# Altium PCB LST.PcbDoc (part 1 of 6)
Units mil, origin at the board's own origin, x right, y up, seen from the top; angles counter-clockwise.
Board outline 4330.71 x 4330.71 mil, 2 copper layers (Top Layer, Bottom Layer), stack 50 mil thick; 464 components, 242 nets, 1328 pads, 128 vias.
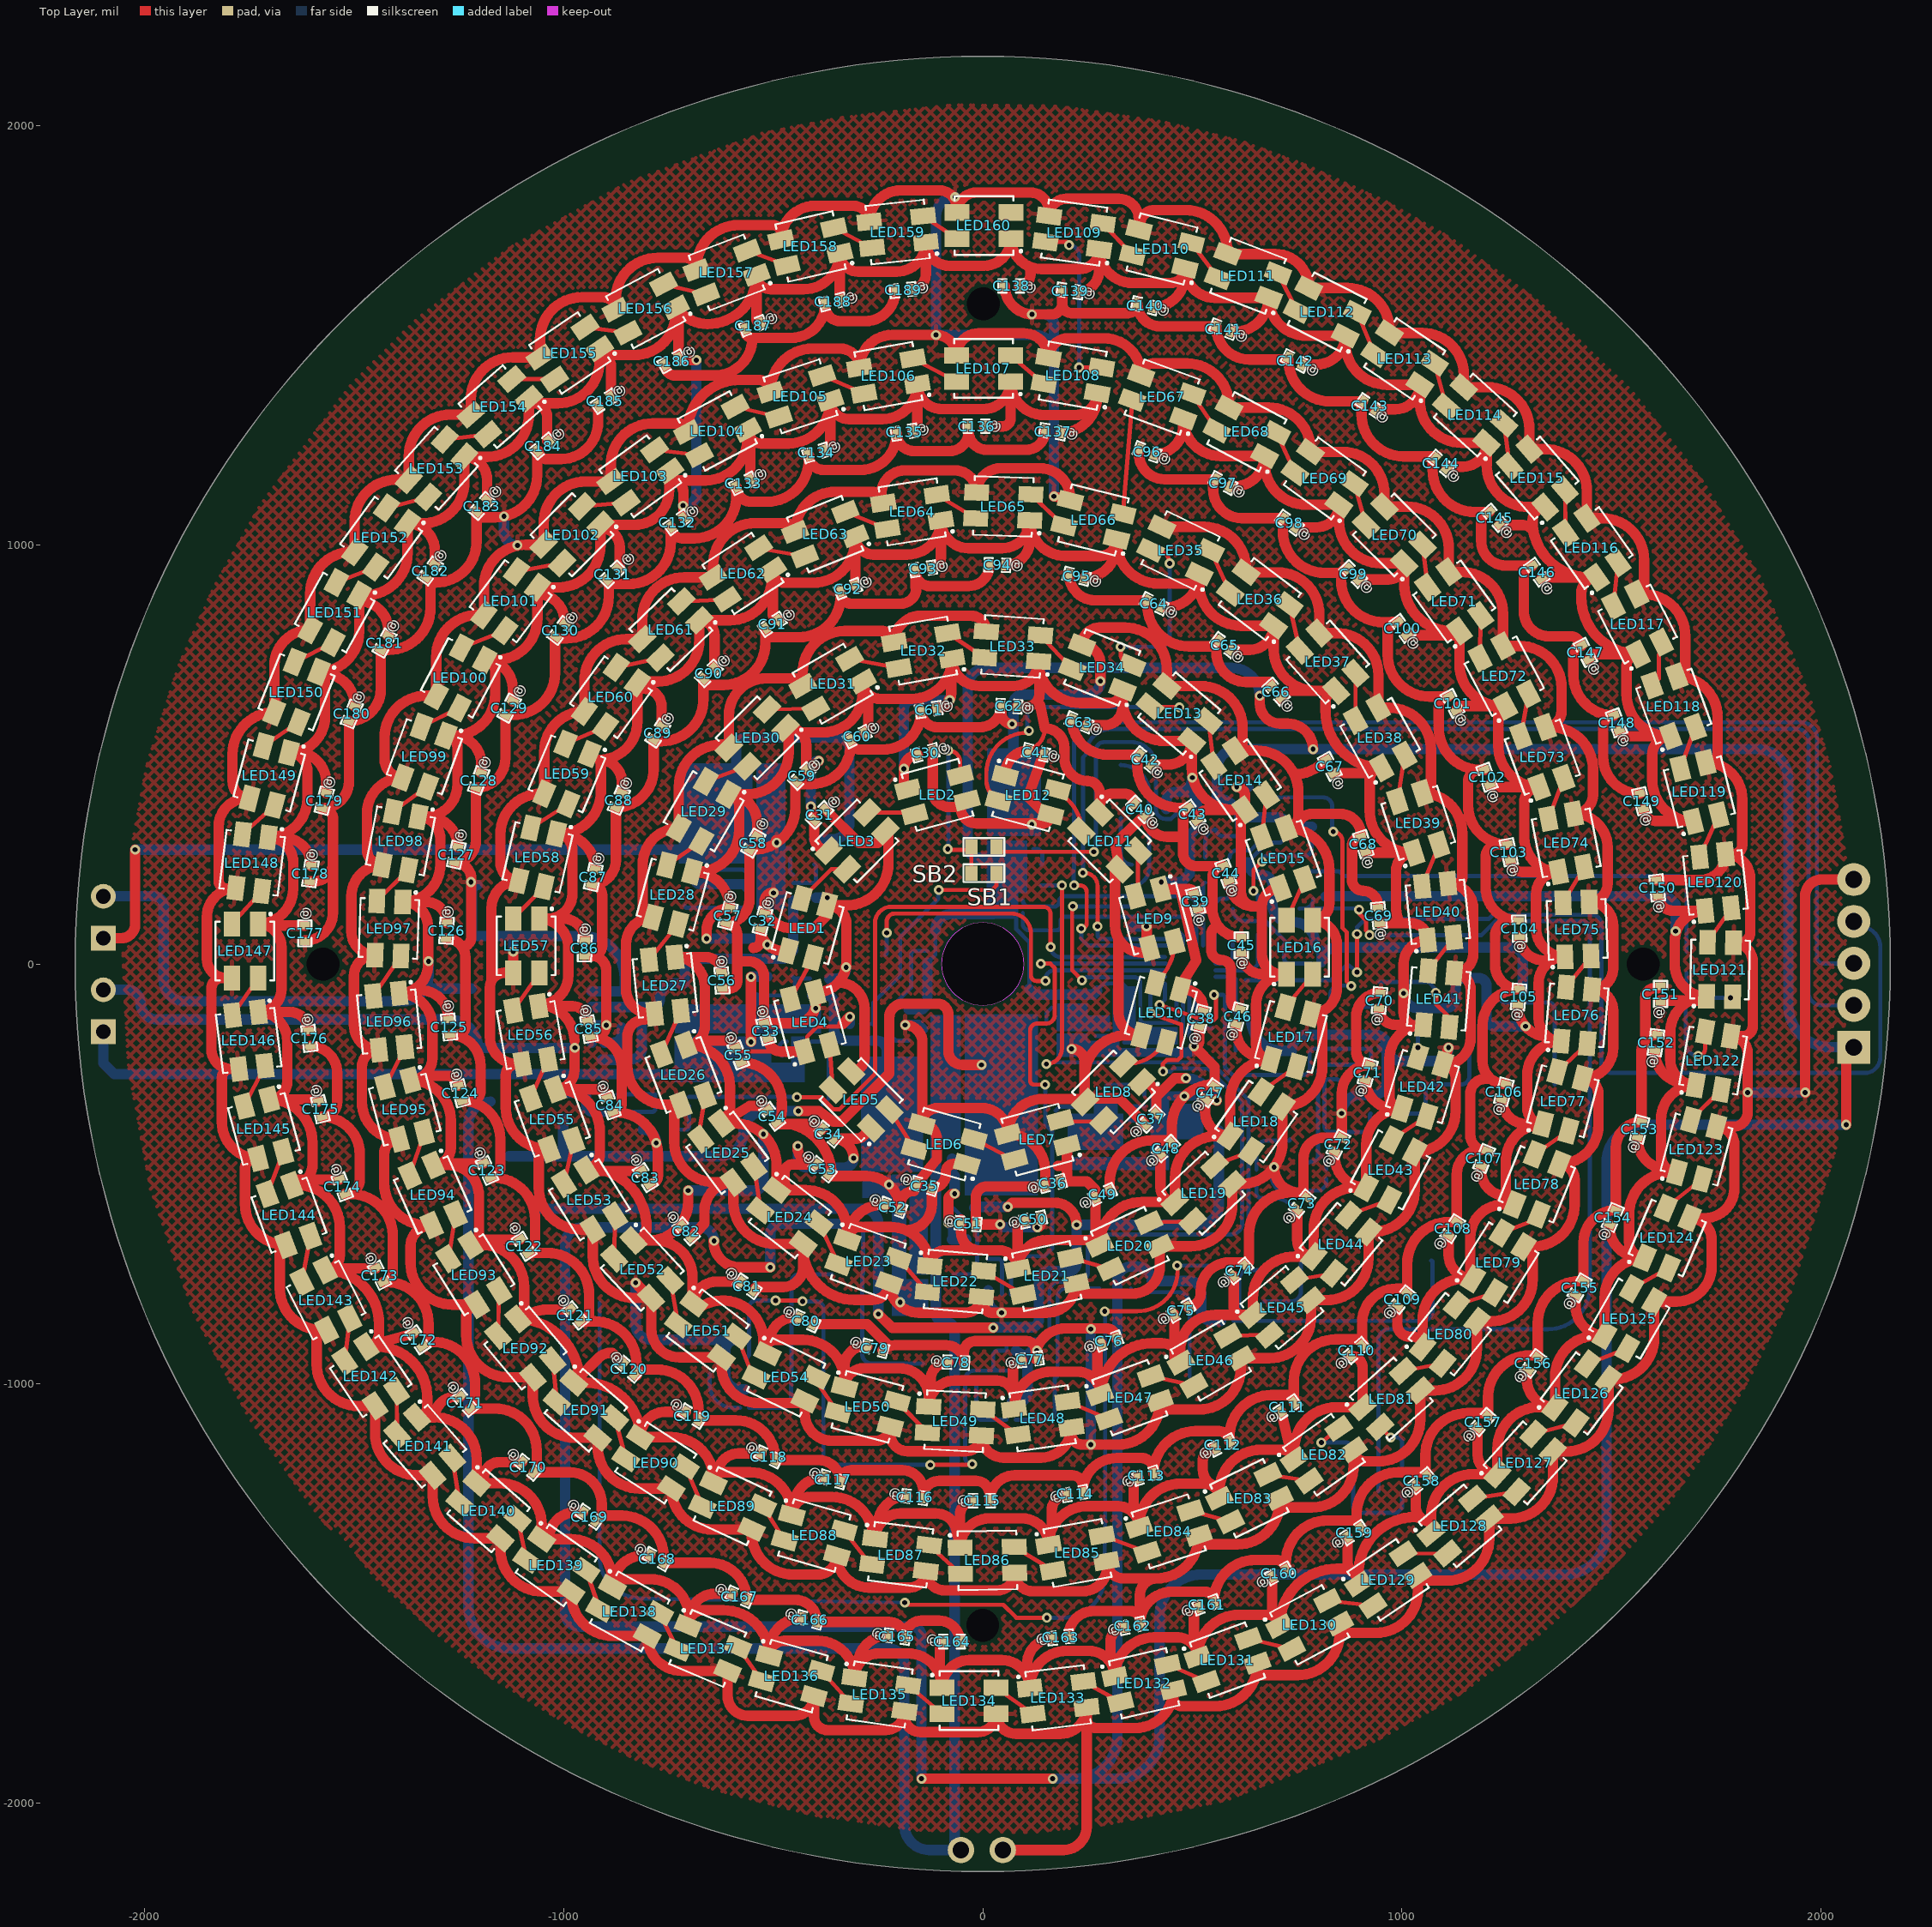
[diagram p0: Top Layer view]
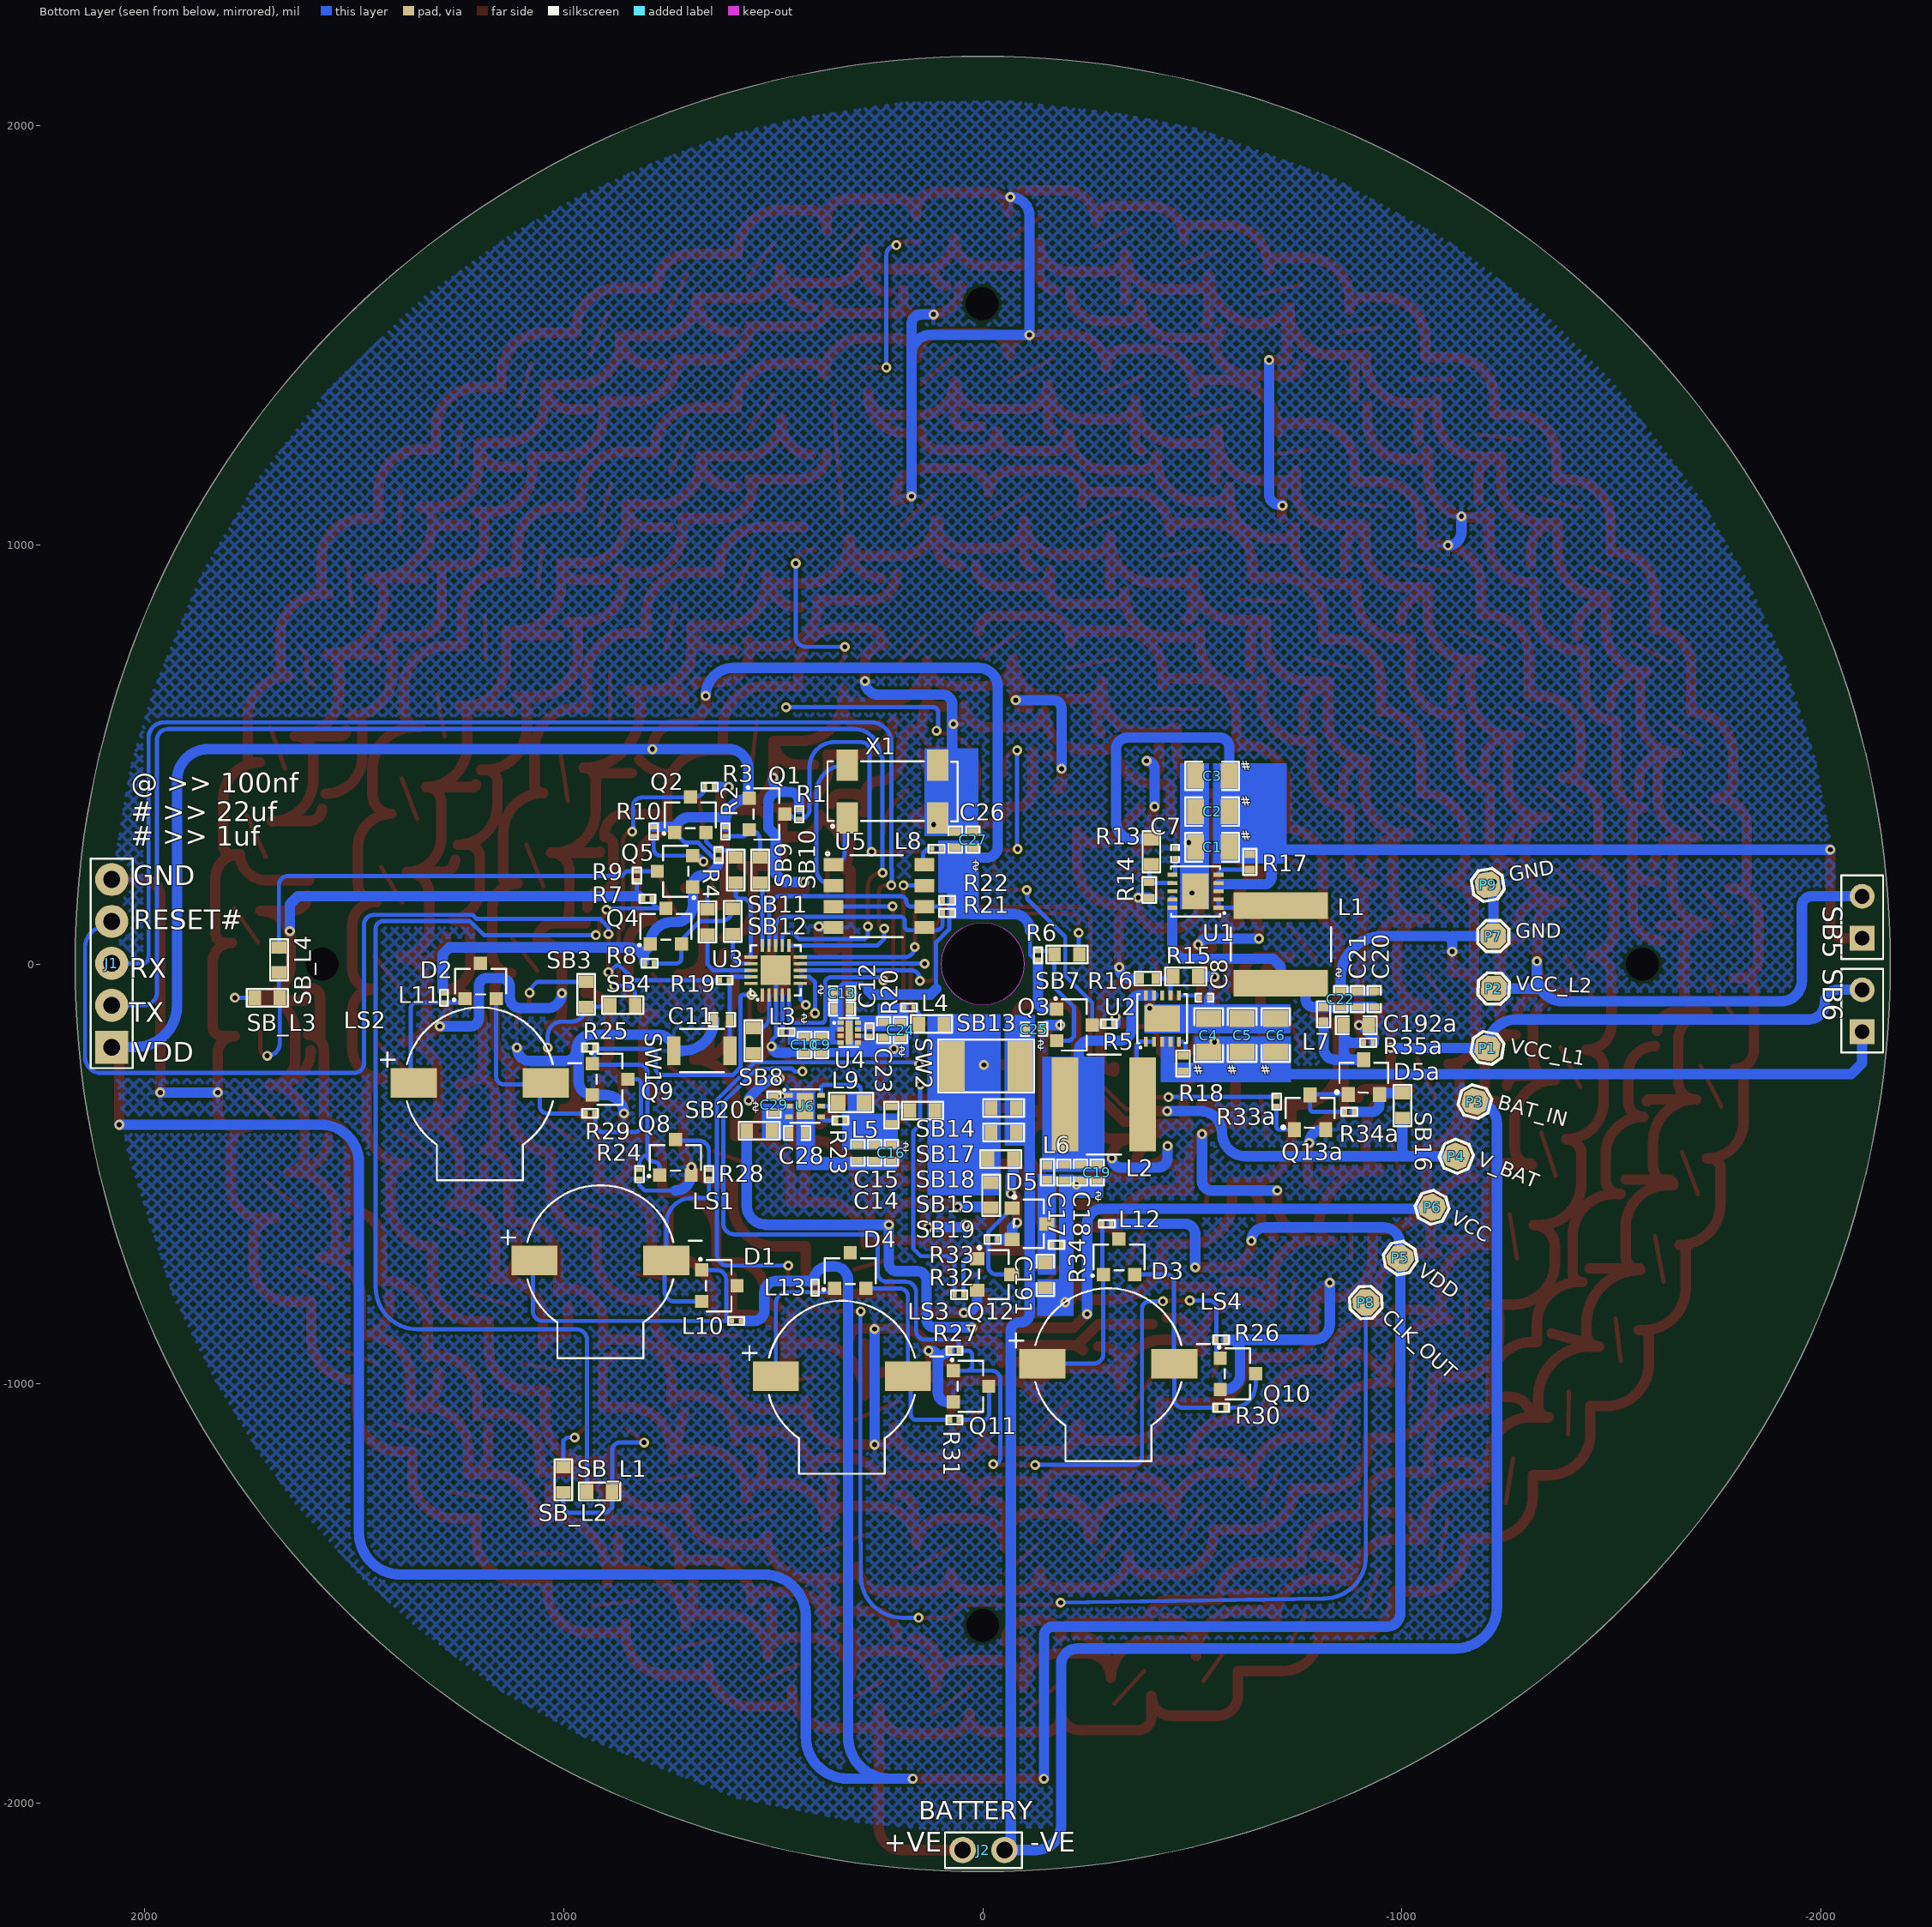
[diagram p1: Bottom Layer view, seen from below]
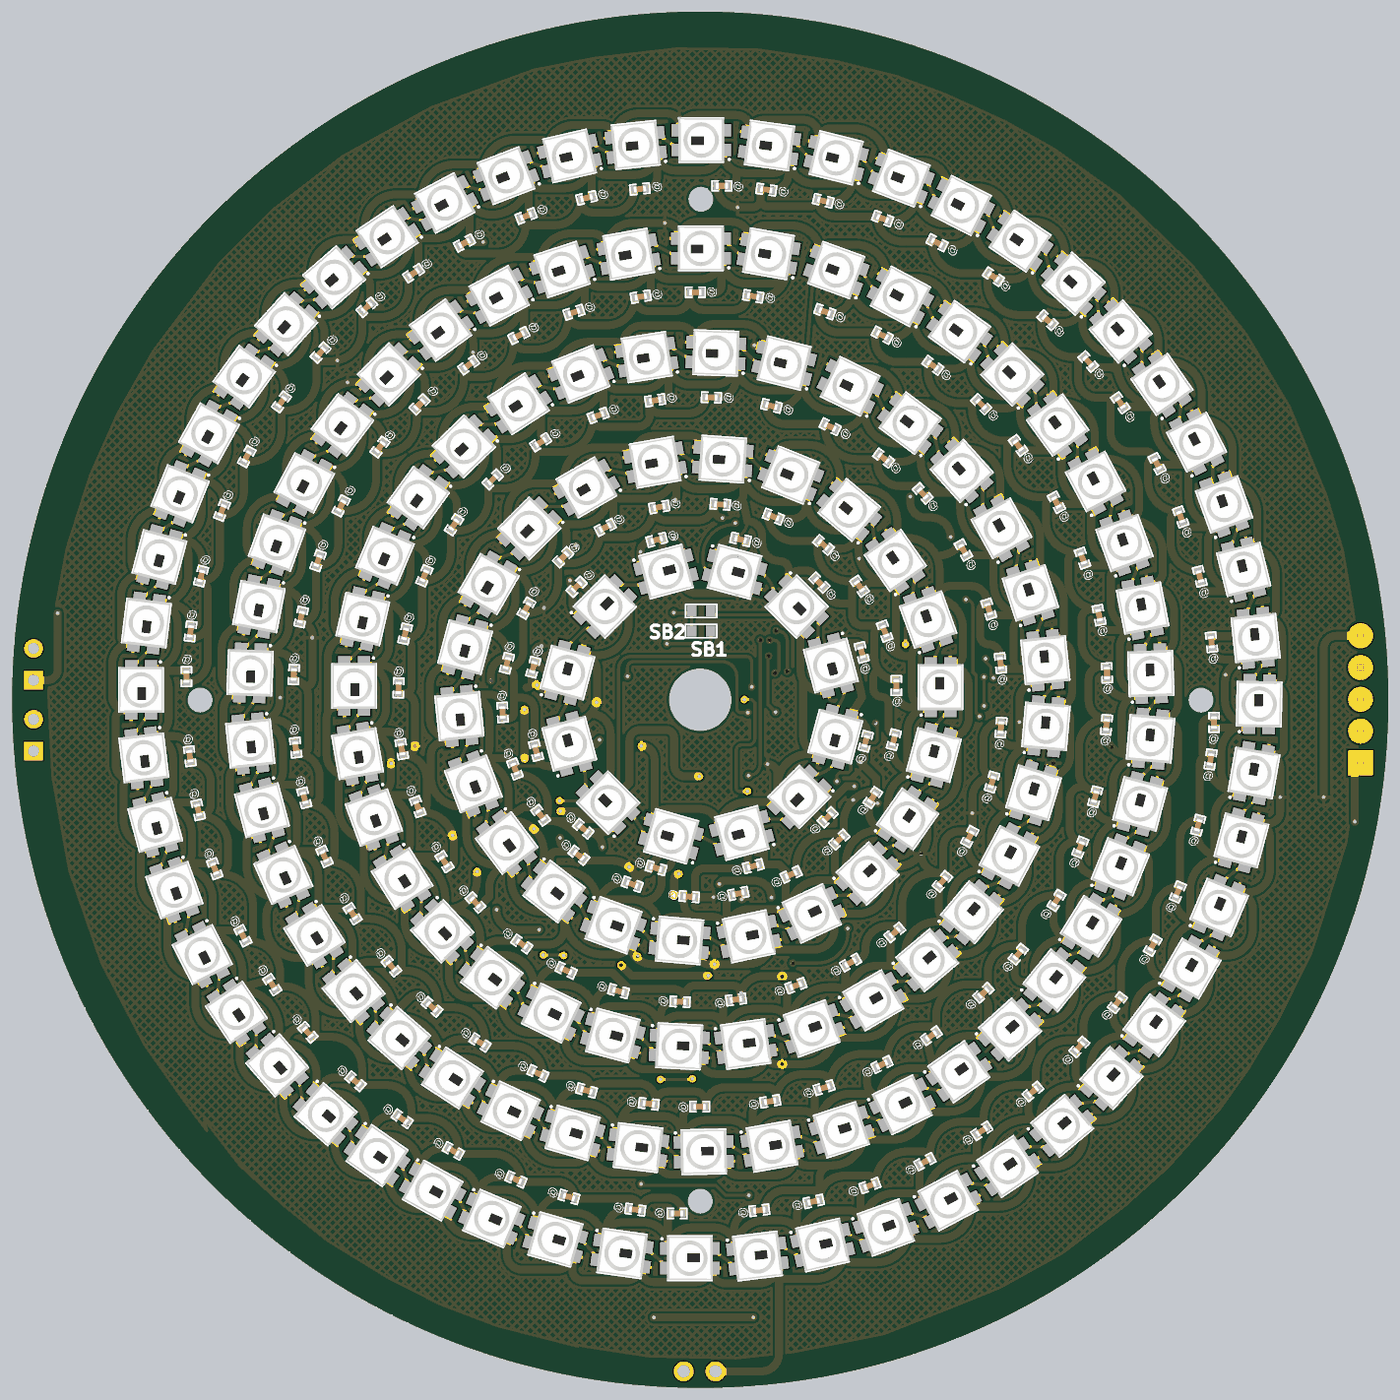
[diagram p6: 3D render of the assembled board from above, using the file's embedded part models]
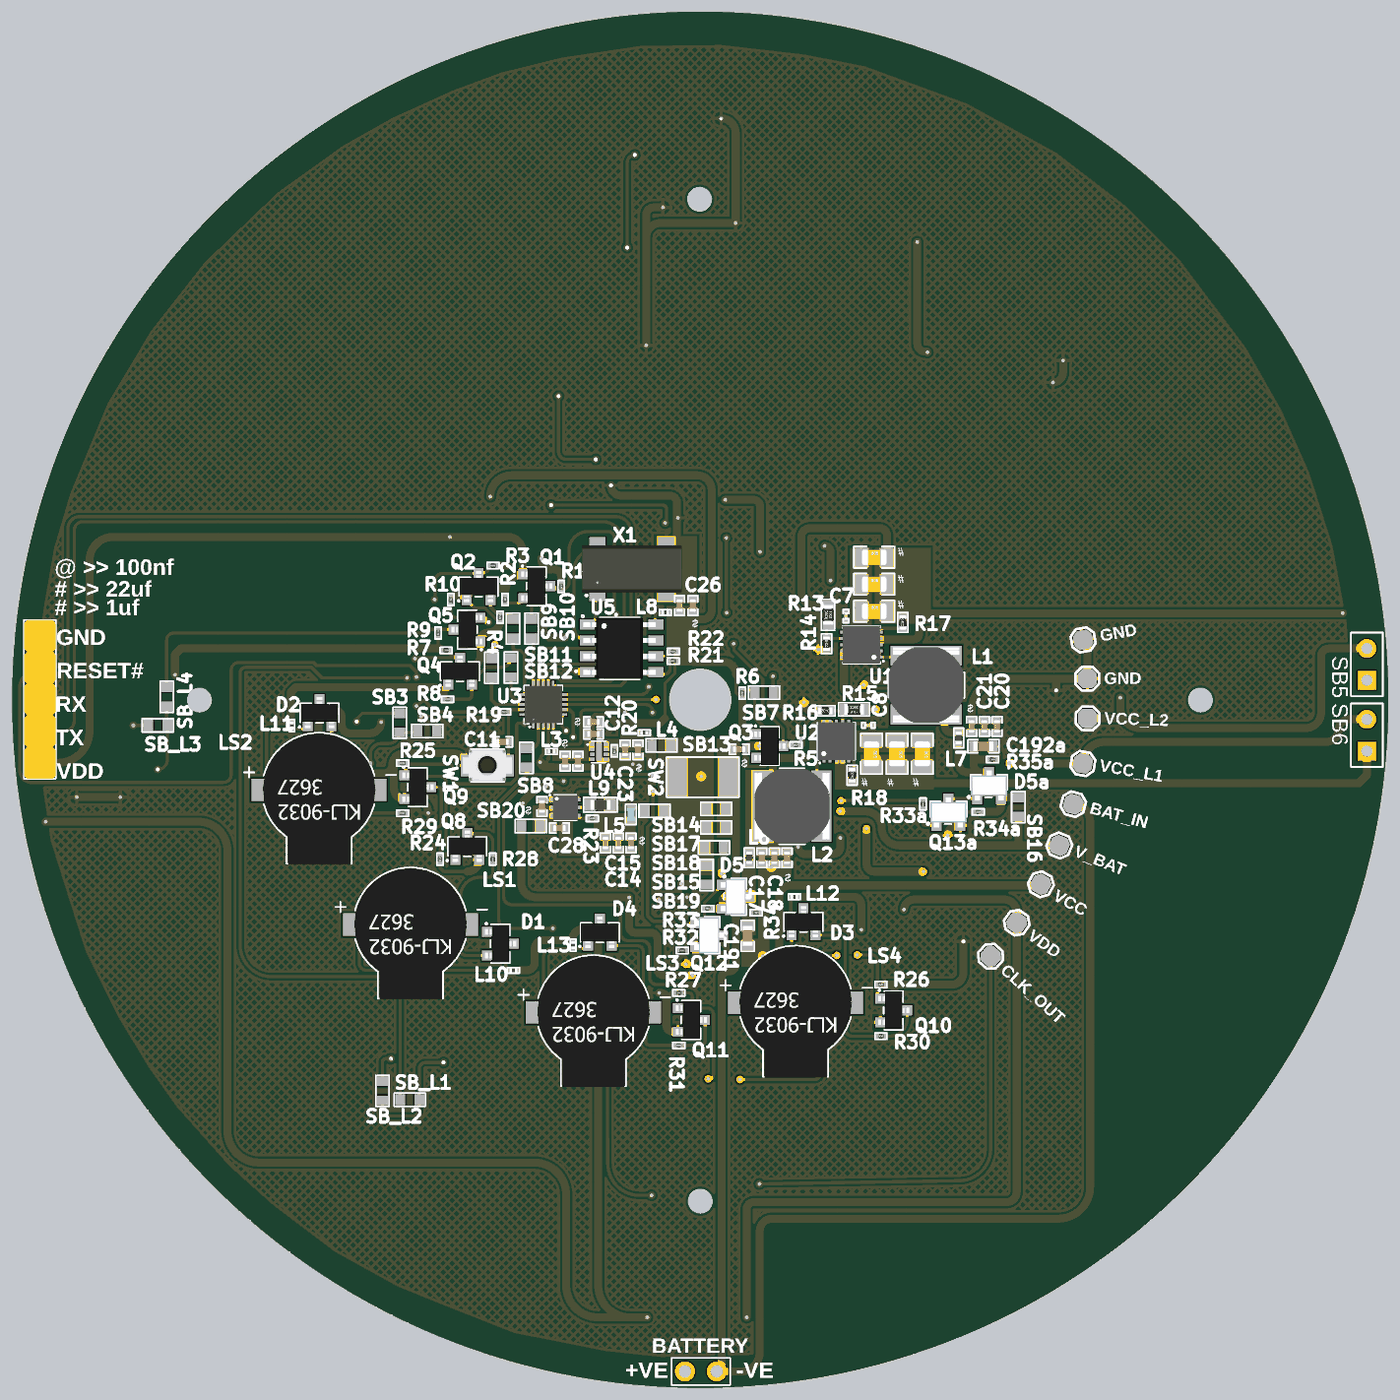
[diagram p7: 3D render of the assembled board from below, using the file's embedded part models]

## Layer stack, top to bottom
Top Solder: solder mask 3, Solder Resist, Dk 3.5
Top Layer: signal copper 10
Dielectric 1: dielectric 37, FR-4, Dk 4.8
Bottom Layer: signal copper 3
Bottom Solder: solder mask 10, Solder Resist, Dk 3.5

## Board outline
-2165.35,1 ccw(c0,1) 0,-2164.35 ccw(c0,1) 2165.35,1 ccw(c0,1) 0,2166.35 ccw(c0,1)
cut-out: -98.43,1 ccw(c0,1) 0,-97.43 ccw(c0,1) 98.43,1 ccw(c0,1) 0,99.43 ccw(c0,1)

## Design rules (kind name [scope] priority, off if disabled: settings)
Clearance [All] p1: gap=7 ignorepadtopadclearanceinfootprint=FALSE except(4: Arc-SMDPad Track-SMDPad SMDPad-SMDPad)
MinimumSolderMaskSliver [All] p1: minsoldermaskwidth=0
PlaneClearance [All] p1: clearance=30
PolygonConnect [All] p1: connectstyle=Relief reliefconductorwidth=10 reliefentries=4 polygonreliefangle="90 Angle" airgapwidth=10
RoutingVias [All] p1: holewidth=11.81 width=23.62 viastyle="Through Hole" minholewidth=11.81 minwidth=23.62 maxholewidth=11.81 maxwidth=23.62
SilkToSilkClearance [All] p1: silktosilkclearance=0
SilkToSolderMaskClearance [IsPad] p1: minsilkscreentomaskgap=0 clearancetoexposedcopper=TRUE
SolderMaskExpansion [All] p1: expansion=4
Width [All] p1: maxlimit=25 minlimit=10 preferedwidth=10
26 further rules are at their usual default settings.

## Classes and differential pairs
component class U_SOUND_SEC: D1 D2 D3 D4 L10 L11 L12 L13 LS1 LS2 LS3 LS4 Q8 Q9 Q10 Q11 R24 R25 R26 R27 R28 R29 R30 R31
component class U_SEC_POWER: C28 C29 L9 R23 SB20 U6
component class U_RTC_SEC: C26 C27 L8 R21 R22 U5 X1
component class "U_Ring 5_D": LED149 LED150 LED151 LED152 LED153 LED154 LED155 LED156 LED157 LED158 LED159 LED160
component class "U_Ring 5_C": LED137 LED138 LED139 LED140 LED141 LED142 LED143 LED144 LED145 LED146 LED147 LED148
component class "U_Ring 5_B": LED123 LED124 LED125 LED126 LED127 LED128 LED129 LED130 LED131 LED132 LED133 LED134 LED135 LED136
component class "U_Ring 5_A": LED109 LED110 LED111 LED112 LED113 LED114 LED115 LED116 LED117 LED118 LED119 LED120 LED121 LED122 SB_L3 SB_L4
component class "U_Ring 4_C": LED96 LED97 LED98 LED99 LED100 LED101 LED102 LED103 LED104 LED105 LED106 LED107 LED108
component class "U_Ring 4_B": LED83 LED84 LED85 LED86 LED87 LED88 LED89 LED90 LED91 LED92 LED93 LED94 LED95
component class "U_Ring 4_A": LED67 LED68 LED69 LED70 LED71 LED72 LED73 LED74 LED75 LED76 LED77 LED78 LED79 LED80 LED81 LED82 SB_L1 SB_L2
component class "U_Ring 3_C": LED58 LED59 LED60 LED61 LED62 LED63 LED64 LED65 LED66
component class "U_Ring 3_B": LED47 LED48 LED49 LED50 LED51 LED52 LED53 LED54 LED55 LED56 LED57
component class "U_Ring 3_A": LED35 LED36 LED37 LED38 LED39 LED40 LED41 LED42 LED43 LED44 LED45 LED46 SB3 SB4
component class "U_Ring 2_B": LED23 LED24 LED25 LED26 LED27 LED28 LED29 LED30 LED31 LED32 LED33 LED34
component class "U_Ring 2_A": LED13 LED14 LED15 LED16 LED17 LED18 LED19 LED20 LED21 LED22
component class "U_Ring 1": LED1 LED2 LED3 LED4 LED5 LED6 LED7 LED8 LED9 LED10 LED11 LED12 SB1 SB2
component class "U_Power Section": P1 P2 P3 P4 P5 P6 P7
component class U_POWER_SWITCH: C14 C15 C16 C17 C18 C19 C20 C21 C22 C23 C24 C25 L4 L5 L6 L7 SB13 SB14 SB15 SB16 SB17 SB18 SB19 SW2
component class U_MCU_POWER: C12 C13 R20 U4
component class U_MAIN_CONN: C9 C10 C11 L3 P8 P9 R19 SB7 SB8 SB9 SB10 SB11 SB12 SW1 U3
component class U_LED_POWER: C1 C2 C3 C4 C5 C6 C7 C8 L1 L2 R13 R14 R15 R16 R17 R18 SB5 SB6 U1 U2
component class "U_LED_POWER 2": C191 C192a D5 D5a Q12 Q13a R32 R33 R33a R34 R34a R35a
component class U_LED_CONV_SIG: Q1 Q2 Q3 Q4 Q5 R1 R2 R3 R4 R5 R6 R7 R8 R9 R10
component class "U_Decoup_Cap 2": C110 C111 C112 C113 C114 C115 C116 C117 C118 C119 C120 C121 C122 C123 C124 C125 C126 C127 C128 C129 C130 C131 C132 C133 C134 C135 C136 C137 C138 C139 C140 C141 C142 C143 C144 C145 C146 C147 C148 C149 C150 C151 C152 C153 C154 C155 C156 C157 C158 C159 C160 C161 C162 C163 C164 C165 C166 C167 C168 C169 C170 C171 C172 C173 C174 C175 C176 C177 C178 C179 C180 C181 C182 C183 C184 C185 C186 C187 C188 C189
component class "U_Decoup_Cap 1": C30 C31 C32 C33 C34 C35 C36 C37 C38 C39 C40 C41 C42 C43 C44 C45 C46 C47 C48 C49 C50 C51 C52 C53 C54 C55 C56 C57 C58 C59 C60 C61 C62 C63 C64 C65 C66 C67 C68 C69 C70 C71 C72 C73 C74 C75 C76 C77 C78 C79 C80 C81 C82 C83 C84 C85 C86 C87 C88 C89 C90 C91 C92 C93 C94 C95 C96 C97 C98 C99 C100 C101 C102 C103 C104 C105 C106 C107 C108 C109
component class "U_Connector Section": J1 J2

## Components (designator, comment, footprint, x,y, rotation, side; value= is the part's Value field where it differs from the comment)
C1 "22uF" Cap0805 -547.5,279.4 r180 bottom
C2 "22uF" Cap0805 -547.5,364.4 r180 bottom
C3 "22uF" Cap0805 -547.5,449.4 r180 bottom
C4 "22uF" Cap0805 -539,-169.1 r270 bottom
C5 "22uF" Cap0805 -619,-169.1 r270 bottom
C6 "22uF" Cap0805 -699,-169.1 r270 bottom
C7 "10nF" "CAP 0201" -459,264.4 r90 bottom
C8 "10nF" "CAP 0201" -529,-79.1 r180 bottom
C9 "100nF" Cap0402 385,-192.11 r90 bottom
C10 "1µF" Cap0402 425,-192.11 r90 bottom
C11 "100nF" Cap0402 622,-131.61 r180 bottom
C12 "100nF" Cap0402 335.73,-106.61 r0 bottom
C13 "1µF" Cap0402 335.73,-68.61 r0 bottom
C14 "2.2uF" Cap0402 298,-449.61 r270 bottom
C15 "100nF" Cap0402 258,-449.61 r270 bottom
C16 "1µF" Cap0402 218,-449.61 r270 bottom
C17 "2.2uF" Cap0402 -193.67,-496.61 r270 bottom
C18 "100nF" Cap0402 -233.33,-496.61 r270 bottom
C19 "1µF" Cap0402 -273,-496.61 r270 bottom
C20 "2.2uF" Cap0402 -934,-83.11 r90 bottom
C21 "100nF" Cap0402 -894,-83.11 r90 bottom
C22 "1µF" Cap0402 -854,-83.11 r90 bottom
C23 "100nF" Cap0402 236,-156.61 r270 bottom
C24 "1µF" Cap0402 196,-156.61 r270 bottom
C25 "1µF" Cap0402 -122.5,-154.61 r0 bottom
C26 "100nF" Cap0402 65.11,297.57 r270 bottom
C27 "1µF" Cap0402 23.22,297.57 r270 bottom
C28 "4.7uF" Cap0402 443,-402.61 r0 bottom
C29 "1µF" Cap0402 498,-334.61 r270 bottom
C30 "100nF" Cap0402 -137,504.39 r195 top
C31 "100nF" Cap0402 -389,356.64 r225 top
C32 "100nF" Cap0402 -525.34,103.39 r255 top
C33 "100nF" Cap0402 -516.79,-158.74 r285 top
C34 "100nF" Cap0402 -368,-404.95 r320 top
C35 "100nF" Cap0402 -139,-528.61 r344 top
C36 "100nF" Cap0402 167,-522.61 r15 top
C37 "100nF" Cap0402 401,-368.61 r45 top
C38 "100nF" Cap0402 521,-129.61 r75 top
C39 "100nF" Cap0402 508.21,150.26 r105 top
C40 "100nF" Cap0402 374.92,369.72 r135 top
C41 "100nF" Cap0402 126.97,505.55 r167 top
C42 "100nF" Cap0402 388,488.39 r320 top
C43 "100nF" Cap0402 501,358.39 r305 top
C44 "100nF" Cap0402 580.33,217.01 r290 top
C45 "100nF" Cap0402 617,45.39 r270 top
C46 "100nF" Cap0402 609.21,-124.48 r255 top
C47 "100nF" Cap0402 543,-306.61 r235 top
C48 "100nF" Cap0402 437.47,-439.23 r223 top
C49 "100nF" Cap0402 286,-548.61 r205 top
C50 "100nF" Cap0402 120,-608.61 r192 top
C51 "100nF" Cap0402 -35,-618.61 r175 top
C52 "100nF" Cap0402 -214,-579.61 r160 top
C53 "100nF" Cap0402 -382,-488.61 r142 top
C54 "100nF" Cap0402 -502,-362.61 r127 top
C55 "100nF" Cap0402 -583,-216.61 r111 top
C56 "100nF" Cap0402 -622,-38.61 r93 top
C57 "100nF" Cap0402 -608.21,116.26 r75 top
C58 "100nF" Cap0402 -547.25,289.37 r60 top
C59 "100nF" Cap0402 -431.33,449.39 r45 top
C60 "100nF" Cap0402 -299,543.39 r27 top
C61 "100nF" Cap0402 -128.85,607.39 r10 top
C62 "100nF" Cap0402 63,616.07 r356 top
C63 "100nF" Cap0402 230,577.39 r338 top
C64 "100nF" Cap0402 409,860.39 r334 top
C65 "100nF" Cap0402 577,761.52 r323 top
C66 "100nF" Cap0402 700,650.39 r312 top
C67 "100nF" Cap0402 828,472.39 r299 top
C68 "100nF" Cap0402 908,286.39 r288 top
C69 "100nF" Cap0402 945,116.39 r276 top
C70 "100nF" Cap0402 946.61,-86.32 r265 top
C71 "100nF" Cap0402 918.41,-257.92 r253 top
C72 "100nF" Cap0402 848,-429.61 r242 top
C73 "100nF" Cap0402 762,-570.61 r230 top
C74 "100nF" Cap0402 612,-731.25 r220 top
C75 "100nF" Cap0402 472.98,-825.86 r210 top
C76 "100nF" Cap0402 301,-898.61 r200 top
C77 "100nF" Cap0402 112.68,-942.19 r188 top
C78 "100nF" Cap0402 -63.53,-949.58 r177 top
C79 "100nF" Cap0402 -257,-916 r165 top
C80 "100nF" Cap0402 -422,-850.61 r155 top
C81 "100nF" Cap0402 -561.66,-767.61 r145 top
C82 "100nF" Cap0402 -707.38,-636.86 r132 top
C83 "100nF" Cap0402 -804.8,-508.63 r122 top
C84 "100nF" Cap0402 -889,-335.61 r110 top
C85 "100nF" Cap0402 -939.21,-154.39 r100 top
C86 "100nF" Cap0402 -949.35,38.44 r88 top
C87 "100nF" Cap0402 -928.84,208.42 r77 top
C88 "100nF" Cap0402 -868,391.39 r67 top
C89 "100nF" Cap0402 -775,551.79 r57 top
C90 "100nF" Cap0402 -653,694.22 r44 top
C91 "100nF" Cap0402 -502.1,811.39 r33 top
C92 "100nF" Cap0402 -321.27,895.76 r21 top
C93 "100nF" Cap0402 -142.04,943.39 r9 top
C94 "100nF" Cap0402 35,952.39 r358 top
C95 "100nF" Cap0402 224.05,925.87 r346 top
C96 "100nF" Cap0402 392,1222.5 r340 top
C97 "100nF" Cap0402 573,1148.39 r332 top
C98 "100nF" Cap0402 732,1053.39 r324 top
C99 "100nF" Cap0402 884,931.13 r315 top
C100 "100nF" Cap0402 1001,801.31 r306 top
C101 "100nF" Cap0402 1121,622.39 r298 top
C102 "100nF" Cap0402 1203,446.39 r290 top
C103 "100nF" Cap0402 1255,267.39 r281 top
C104 "100nF" Cap0402 1280,85.39 r272 top
C105 "100nF" Cap0402 1278.38,-77.71 r265 top
C106 "100nF" Cap0402 1243,-303.93 r255 top
C107 "100nF" Cap0402 1196,-463.03 r248 top
C108 "100nF" Cap0402 1121.2,-630.3 r238 top
C109 "100nF" Cap0402 1001,-799.61 r231 top
C110 "100nF" Cap0402 891.25,-920.99 r222 top
C111 "100nF" Cap0402 727,-1056.21 r215 top
C112 "100nF" Cap0402 572,-1146.61 r206 top
C113 "100nF" Cap0402 390,-1219.61 r198 top
C114 "100nF" Cap0402 220,-1262.61 r190 top
C115 "100nF" Cap0402 -2,-1279.61 r180 top
C116 "100nF" Cap0402 -162,-1270.61 r173 top
C117 "100nF" Cap0402 -358,-1228.61 r164 top
C118 "100nF" Cap0402 -511,-1174.61 r155 top
C119 "100nF" Cap0402 -693,-1077.61 r147 top
C120 "100nF" Cap0402 -844,-965.61 r139 top
C121 "100nF" Cap0402 -971.89,-837.44 r130 top
C122 "100nF" Cap0402 -1094,-672.51 r122 top
C123 "100nF" Cap0402 -1182.48,-491.72 r114 top
C124 "100nF" Cap0402 -1246.14,-307.61 r105 top
C125 "100nF" Cap0402 -1273,-149.64 r96 top
C126 "100nF" Cap0402 -1279,80.39 r87 top
C127 "100nF" Cap0402 -1256,261.39 r77 top
C128 "100nF" Cap0402 -1202.67,438.77 r70 top
C129 "100nF" Cap0402 -1130,611.39 r62 top
C130 "100nF" Cap0402 -1008,796.39 r53 top
C131 "100nF" Cap0402 -883.39,930.34 r45 top
C132 "100nF" Cap0402 -729,1054.39 r36 top
C133 "100nF" Cap0402 -571,1147.39 r27 top
C134 "100nF" Cap0402 -397.33,1220.39 r18 top
C135 "100nF" Cap0402 -187,1269.39 r10 top
C136 "100nF" Cap0402 -15,1283.39 r0 top
C137 "100nF" Cap0402 166.78,1270.75 r350 top
C138 "100nF" Cap0402 68,1618.39 r0 top
C139 "100nF" Cap0402 208,1606.39 r352 top
C140 "100nF" Cap0402 387,1571.39 r346 top
C141 "100nF" Cap0402 574,1515.39 r339 top
C142 "100nF" Cap0402 745.48,1439.39 r333 top
C143 "100nF" Cap0402 922.69,1332.39 r326 top
C144 "100nF" Cap0402 1093,1195.39 r318 top
C145 "100nF" Cap0402 1221,1065.26 r311 top
C146 "100nF" Cap0402 1322,935.39 r305 top
C147 "100nF" Cap0402 1437.6,743.87 r297 top
C148 "100nF" Cap0402 1512,576.39 r290 top
C149 "100nF" Cap0402 1572,389.19 r284 top
C150 "100nF" Cap0402 1609,182.39 r276 top
C151 "100nF" Cap0402 1617,-70.61 r270 top
C152 "100nF" Cap0402 1606,-186.61 r262 top
C153 "100nF" Cap0402 1567,-393.61 r255 top
C154 "100nF" Cap0402 1503,-603.61 r247 top
C155 "100nF" Cap0402 1424,-771.61 r240 top
C156 "100nF" Cap0402 1313,-951.97 r233 top
C157 "100nF" Cap0402 1193,-1091.61 r228 top
C158 "100nF" Cap0402 1047,-1231.61 r220 top
C159 "100nF" Cap0402 886,-1355.61 r214 top
C160 "100nF" Cap0402 707,-1452.61 r208 top
C161 "100nF" Cap0402 534,-1527.61 r200 top
C162 "100nF" Cap0402 357,-1577.75 r193 top
C163 "100nF" Cap0402 186,-1605.61 r187 top
C164 "100nF" Cap0402 -73,-1615.61 r180 top
C165 "100nF" Cap0402 -204.58,-1603.61 r172 top
C166 "100nF" Cap0402 -413,-1563.61 r164 top
C167 "100nF" Cap0402 -580,-1508.61 r157 top
C168 "100nF" Cap0402 -777,-1418.61 r151 top
C169 "100nF" Cap0402 -938,-1317.61 r145 top
C170 "100nF" Cap0402 -1085,-1199.61 r139 top
C171 "100nF" Cap0402 -1235,-1045.6 r131 top
C172 "100nF" Cap0402 -1347,-895.61 r123 top
C173 "100nF" Cap0402 -1439,-741.61 r117 top
C174 "100nF" Cap0402 -1528,-530.61 r110 top
C175 "100nF" Cap0402 -1580,-345.61 r103 top
C176 "100nF" Cap0402 -1606.25,-176.61 r97 top
C177 "100nF" Cap0402 -1617,73.89 r90 top
C178 "100nF" Cap0402 -1604,216.39 r83 top
C179 "100nF" Cap0402 -1571,390.39 r75 top
C180 "100nF" Cap0402 -1505,597.39 r68 top
C181 "100nF" Cap0402 -1427,766.39 r61 top
C182 "100nF" Cap0402 -1318,938.39 r54 top
C183 "100nF" Cap0402 -1195,1093.39 r48 top
C184 "100nF" Cap0402 -1049,1236.39 r41 top
C185 "100nF" Cap0402 -902,1343.39 r34 top
C186 "100nF" Cap0402 -742,1438.39 r28 top
C187 "100nF" Cap0402 -548,1523.39 r21 top
C188 "100nF" Cap0402 -357.65,1580.39 r14 top
C189 "100nF" Cap0402 -190,1608.39 r6 top
C191 "10uF" Cap0603 -149,-742 r90 bottom
C192a "10uF" Cap0603 -891,-145.11 r0 bottom
D1 "BAL74,215" SOT23-3 628.43,-766.61 r270 bottom
D2 "BAL74,215" SOT23-3 1198,-39.61 r180 bottom
D3 "BAL74,215" SOT23-3 -325,-697.61 r180 bottom
D4 "BAL74,215" SOT23-3 316,-730.61 r180 bottom
D5 "SSM3J334R,LF" SOT-23F -111.46,-619 r270 bottom
D5a "SSM3J334R,LF" SOT-23F -909,-269 r180 bottom
J1 "PZ254V-11-05P" PZ254V-11-05P 2078,2.39 r90 bottom
J2 "THT PADS" "THT PAD" -52,-2112.61 r0 bottom
L1 "1uH" 1255AY-1R0N=P3 -711,47.37 r270 bottom
L2 "1uH" 1255AY-1R0N=P3 -289,-334.1 r0 bottom
L3 "MMZ0603S601CT000" "IND 0201" 468,-161.61 r0 bottom
L4 "MMZ0603S601CT000" "IND 0201" 176.17,-103 r0 bottom
L5 "GZ1005D100TF" "IND 0402 (1005 Metric)" 218,-359.61 r270 bottom value=Custom
L6 "HCB1005MF-100T25" HCB1005MF-100T25 -154,-496.53 r90 bottom
L7 "HCB1005MF-100T25" HCB1005MF-100T25 -813,-119.28 r90 bottom
L8 "MMZ0603S601CT000" "IND 0201" 110,275.57 r0 bottom
L9 "1uH" "IND 0603" 314,-329.61 r0 bottom
L10 "MMZ0603S601CT000" "IND 0201" 587.86,-850.61 r0 bottom
L11 "MMZ0603S601CT000" "IND 0201" 1285,-80.18 r270 bottom
L12 "MMZ0603S601CT000" "IND 0201" -296.17,-619 r0 bottom
L13 "MMZ0603S601CT000" "IND 0201" 400,-771.18 r270 bottom
LED1 "WS2812B-Mini" WS2812B-Mini -418,86.39 r75 top
LED2 "WS2812B-Mini" WS2812B-Mini -108,404.34 r15 top
LED3 "WS2812B-Mini" WS2812B-Mini -300,294.39 r45 top
LED4 "WS2812B-Mini" WS2812B-Mini -412,-137.61 r105 top
LED5 "WS2812B-Mini" WS2812B-Mini -290,-322.92 r135 top
LED6 "WS2812B-Mini" WS2812B-Mini -91.78,-428.61 r164 top
LED7 "WS2812B-Mini" WS2812B-Mini 130.58,-418.28 r195 top
LED8 "WS2812B-Mini" WS2812B-Mini 312,-304.61 r225 top
LED9 "WS2812B-Mini" WS2812B-Mini 411.08,108.96 r285 top
LED10 "WS2812B-Mini" WS2812B-Mini 425,-115.04 r255 top
LED11 "WS2812B-Mini" WS2812B-Mini 303,294.39 r315 top
LED12 "WS2812B-Mini" WS2812B-Mini 108,403.39 r345 top
LED13 "WS2812B-Mini" WS2812B-Mini 469,598.39 r140 top
LED14 "WS2812B-Mini" WS2812B-Mini 614,439.39 r125 top
LED15 "WS2812B-Mini" WS2812B-Mini 717,253.39 r110 top
LED16 "WS2812B-Mini" WS2812B-Mini 755.9,40.82 r90 top
LED17 "WS2812B-Mini" WS2812B-Mini 735.25,-172.93 r75 top
LED18 "WS2812B-Mini" WS2812B-Mini 652.49,-374.66 r55 top
LED19 "WS2812B-Mini" WS2812B-Mini 527,-545.61 r43 top
LED20 "WS2812B-Mini" WS2812B-Mini 351,-671.61 r25 top
LED21 "WS2812B-Mini" WS2812B-Mini 153,-743.61 r12 top
LED22 "WS2812B-Mini" WS2812B-Mini -65,-756.61 r355 top
LED23 "WS2812B-Mini" WS2812B-Mini -273,-708.61 r340 top
LED24 "WS2812B-Mini" WS2812B-Mini -460,-602.61 r322 top
LED25 "WS2812B-Mini" WS2812B-Mini -609,-449.61 r307 top
LED26 "WS2812B-Mini" WS2812B-Mini -714,-263.61 r291 top
LED27 "WS2812B-Mini" WS2812B-Mini -758,-50.29 r276 top
LED28 "WS2812B-Mini" WS2812B-Mini -740,166.39 r255 top
LED29 "WS2812B-Mini" WS2812B-Mini -665.78,365.07 r240 top
LED30 "WS2812B-Mini" WS2812B-Mini -538,540.39 r225 top
LED31 "WS2812B-Mini" WS2812B-Mini -358,669.39 r210 top
LED32 "WS2812B-Mini" WS2812B-Mini -142,748.39 r190 top
LED33 "WS2812B-Mini" WS2812B-Mini 71,758.39 r176 top
LED34 "WS2812B-Mini" WS2812B-Mini 285,708.39 r158 top
LED35 "WS2812B-Mini" WS2812B-Mini 472,987.39 r154 top
LED36 "WS2812B-Mini" WS2812B-Mini 661,871.39 r143 top
LED37 "WS2812B-Mini" WS2812B-Mini 823,721.39 r132 top
LED38 "WS2812B-Mini" WS2812B-Mini 948,540.39 r119 top
LED39 "WS2812B-Mini" WS2812B-Mini 1039,337.39 r108 top
LED40 "WS2812B-Mini" WS2812B-Mini 1086,125.39 r96 top
LED41 "WS2812B-Mini" WS2812B-Mini 1088,-82.61 r85 top
LED42 "WS2812B-Mini" WS2812B-Mini 1049,-291.61 r73 top
LED43 "WS2812B-Mini" WS2812B-Mini 972.77,-490.2 r62 top
LED44 "WS2812B-Mini" WS2812B-Mini 855,-667.61 r50 top
LED45 "WS2812B-Mini" WS2812B-Mini 714,-818.61 r40 top
LED46 "WS2812B-Mini" WS2812B-Mini 544.53,-944.96 r30 top
LED47 "WS2812B-Mini" WS2812B-Mini 351,-1033.61 r20 top
LED48 "WS2812B-Mini" WS2812B-Mini 143,-1082.61 r8 top
LED49 "WS2812B-Mini" WS2812B-Mini -66,-1089.61 r357 top
LED50 "WS2812B-Mini" WS2812B-Mini -275,-1055.61 r345 top
LED51 "WS2812B-Mini" WS2812B-Mini -656,-873.61 r323 top
LED52 "WS2812B-Mini" WS2812B-Mini -812.05,-727.61 r313 top
LED53 "WS2812B-Mini" WS2812B-Mini -938.14,-561.61 r302 top
LED54 "WS2812B-Mini" WS2812B-Mini -469,-984.96 r334 top
LED55 "WS2812B-Mini" WS2812B-Mini -1027,-369.61 r290 top
LED56 "WS2812B-Mini" WS2812B-Mini -1078.58,-168.62 r280 top
LED57 "WS2812B-Mini" WS2812B-Mini -1089,44.39 r270 top
LED58 "WS2812B-Mini" WS2812B-Mini -1062,255.39 r257 top
LED59 "WS2812B-Mini" WS2812B-Mini -992,454.39 r247 top
LED60 "WS2812B-Mini" WS2812B-Mini -887,637.39 r234 top
LED61 "WS2812B-Mini" WS2812B-Mini -744,798.39 r224 top
LED62 "WS2812B-Mini" WS2812B-Mini -572,932.39 r213 top
LED63 "WS2812B-Mini" WS2812B-Mini -376,1026.39 r202 top
LED64 "WS2812B-Mini" WS2812B-Mini -168.32,1079.39 r189 top
LED65 "WS2812B-Mini" WS2812B-Mini 49,1092.39 r178 top
LED66 "WS2812B-Mini" WS2812B-Mini 264,1060.39 r166 top
LED67 "WS2812B-Mini" WS2812B-Mini 428,1353.39 r160 top
LED68 "WS2812B-Mini" WS2812B-Mini 630,1270.39 r152 top
LED69 "WS2812B-Mini" WS2812B-Mini 816,1159.39 r144 top
LED70 "WS2812B-Mini" WS2812B-Mini 982,1024.39 r135 top
LED71 "WS2812B-Mini" WS2812B-Mini 1124.61,865.61 r126 top
LED72 "WS2812B-Mini" WS2812B-Mini 1244.23,687.8 r118 top
LED73 "WS2812B-Mini" WS2812B-Mini 1335,494.39 r110 top
LED74 "WS2812B-Mini" WS2812B-Mini 1392.15,289.84 r101 top
LED75 "WS2812B-Mini" WS2812B-Mini 1418,83.39 r92 top
LED76 "WS2812B-Mini" WS2812B-Mini 1417,-121.61 r85 top
LED77 "WS2812B-Mini" WS2812B-Mini 1384,-326.61 r75 top
LED78 "WS2812B-Mini" WS2812B-Mini 1322,-524.61 r68 top
LED79 "WS2812B-Mini" WS2812B-Mini 1230,-711.61 r58 top
LED80 "WS2812B-Mini" WS2812B-Mini 1114.2,-882.22 r51 top
LED81 "WS2812B-Mini" WS2812B-Mini 975,-1036.61 r42 top
LED82 "WS2812B-Mini" WS2812B-Mini 814,-1169.61 r35 top
LED83 "WS2812B-Mini" WS2812B-Mini 636,-1273.61 r26 top
LED84 "WS2812B-Mini" WS2812B-Mini 444,-1352.61 r18 top
LED85 "WS2812B-Mini" WS2812B-Mini 226.01,-1404.19 r10 top
LED86 "WS2812B-Mini" WS2812B-Mini 11,-1421.61 r1 top
LED87 "WS2812B-Mini" WS2812B-Mini -196,-1408.61 r353 top
LED88 "WS2812B-Mini" WS2812B-Mini -401.67,-1362.24 r344 top
LED89 "WS2812B-Mini" WS2812B-Mini -597,-1292.61 r335 top
LED90 "WS2812B-Mini" WS2812B-Mini -780,-1189.19 r327 top
LED91 "WS2812B-Mini" WS2812B-Mini -946.87,-1063.5 r319 top
LED92 "WS2812B-Mini" WS2812B-Mini -1091,-915.5 r310 top
LED93 "WS2812B-Mini" WS2812B-Mini -1214,-740.61 r302 top
LED94 "WS2812B-Mini" WS2812B-Mini -1312.15,-550.25 r294 top
LED95 "WS2812B-Mini" WS2812B-Mini -1379,-346.61 r285 top
LED96 "WS2812B-Mini" WS2812B-Mini -1416,-136.61 r276 top
LED97 "WS2812B-Mini" WS2812B-Mini -1416.65,85.56 r268 top
LED98 "WS2812B-Mini" WS2812B-Mini -1389,294.39 r259 top
LED99 "WS2812B-Mini" WS2812B-Mini -1332,495.39 r250 top
LED100 "WS2812B-Mini" WS2812B-Mini -1246,683.39 r242 top
LED101 "WS2812B-Mini" WS2812B-Mini -1126,866.39 r233 top
LED102 "WS2812B-Mini" WS2812B-Mini -979.66,1024.74 r225 top
LED103 "WS2812B-Mini" WS2812B-Mini -817,1164.39 r216 top
LED104 "WS2812B-Mini" WS2812B-Mini -633,1272.39 r208 top
LED105 "WS2812B-Mini" WS2812B-Mini -434.8,1355.17 r198 top
LED106 "WS2812B-Mini" WS2812B-Mini -225,1403.39 r190 top
LED107 "WS2812B-Mini" WS2812B-Mini 2,1421.39 r180 top
LED108 "WS2812B-Mini" WS2812B-Mini 215,1404.39 r170 top
LED109 "WS2812B-Mini" WS2812B-Mini 218,1745.39 r172 top
LED110 "WS2812B-Mini" WS2812B-Mini 427.6,1706.39 r166 top
LED111 "WS2812B-Mini" WS2812B-Mini 633,1642.39 r159 top
LED112 "WS2812B-Mini" WS2812B-Mini 821.59,1556.41 r153 top
LED113 "WS2812B-Mini" WS2812B-Mini 1006.51,1444.39 r146 top
LED114 "WS2812B-Mini" WS2812B-Mini 1175,1310.39 r138 top
LED115 "WS2812B-Mini" WS2812B-Mini 1323,1159.91 r131 top
LED116 "WS2812B-Mini" WS2812B-Mini 1453,993.39 r125 top
LED117 "WS2812B-Mini" WS2812B-Mini 1561.97,811.8 r117 top
LED118 "WS2812B-Mini" WS2812B-Mini 1648.69,615.74 r110 top
LED119 "WS2812B-Mini" WS2812B-Mini 1710,411.39 r104 top
LED120 "WS2812B-Mini" WS2812B-Mini 1748,195.39 r96 top
LED121 "WS2812B-Mini" WS2812B-Mini 1759,-12.61 r89 top
LED122 "WS2812B-Mini" WS2812B-Mini 1742.58,-229.62 r80 top
LED123 "WS2812B-Mini" WS2812B-Mini 1703,-441.61 r75 top
LED124 "WS2812B-Mini" WS2812B-Mini 1633,-652.61 r67 top
LED125 "WS2812B-Mini" WS2812B-Mini 1542.78,-844.98 r60 top
LED126 "WS2812B-Mini" WS2812B-Mini 1429,-1023.36 r53 top
LED127 "WS2812B-Mini" WS2812B-Mini 1294,-1189.19 r48 top
LED128 "WS2812B-Mini" WS2812B-Mini 1139,-1339.61 r40 top
LED129 "WS2812B-Mini" WS2812B-Mini 967.21,-1467.93 r34 top
LED130 "WS2812B-Mini" WS2812B-Mini 780,-1575.61 r28 top
LED131 "WS2812B-Mini" WS2812B-Mini 583.87,-1659.61 r20 top
LED132 "WS2812B-Mini" WS2812B-Mini 384.83,-1715.05 r13 top
LED133 "WS2812B-Mini" WS2812B-Mini 180,-1749.61 r7 top
LED134 "WS2812B-Mini" WS2812B-Mini -32.57,-1756.51 r0 top
LED135 "WS2812B-Mini" WS2812B-Mini -246.12,-1741.61 r352 top
LED136 "WS2812B-Mini" WS2812B-Mini -456,-1697.61 r344 top
LED137 "WS2812B-Mini" WS2812B-Mini -656,-1631.61 r337 top
LED138 "WS2812B-Mini" WS2812B-Mini -842,-1543.61 r331 top
LED139 "WS2812B-Mini" WS2812B-Mini -1017,-1433.61 r325 top
LED140 "WS2812B-Mini" WS2812B-Mini -1178.87,-1303.5 r319 top
LED141 "WS2812B-Mini" WS2812B-Mini -1331,-1149.61 r311 top
LED142 "WS2812B-Mini" WS2812B-Mini -1460,-982.61 r304 top
LED143 "WS2812B-Mini" WS2812B-Mini -1567,-800.93 r297 top
LED144 "WS2812B-Mini" WS2812B-Mini -1655,-598.16 r290 top
LED145 "WS2812B-Mini" WS2812B-Mini -1715,-392.61 r285 top
LED146 "WS2812B-Mini" WS2812B-Mini -1751,-181.61 r277 top
LED147 "WS2812B-Mini" WS2812B-Mini -1760,31.9 r270 top
LED148 "WS2812B-Mini" WS2812B-Mini -1743,242.39 r263 top
LED149 "WS2812B-Mini" WS2812B-Mini -1702,450.39 r255 top
LED150 "WS2812B-Mini" WS2812B-Mini -1637,649.39 r248 top
LED151 "WS2812B-Mini" WS2812B-Mini -1546,839.39 r241 top
LED152 "WS2812B-Mini" WS2812B-Mini -1435.21,1017.91 r234 top
LED153 "WS2812B-Mini" WS2812B-Mini -1303,1183.39 r228 top
LED154 "WS2812B-Mini" WS2812B-Mini -1152,1330.39 r221 top
LED155 "WS2812B-Mini" WS2812B-Mini -985,1458.39 r214 top
LED156 "WS2812B-Mini" WS2812B-Mini -804,1564.39 r208 top
LED157 "WS2812B-Mini" WS2812B-Mini -611,1650.39 r201 top
LED158 "WS2812B-Mini" WS2812B-Mini -411,1712.39 r193 top
LED159 "WS2812B-Mini" WS2812B-Mini -203,1746.89 r186 top
LED160 "WS2812B-Mini" WS2812B-Mini 3,1762.39 r180 top
LS1 "YS-SBZ9032C03R16" YS-SBZ9032C03R16 912,-706.61 r180 bottom
LS2 "YS-SBZ9032C03R16" YS-SBZ9032C03R16 1199.48,-282.61 r180 bottom
LS3 "YS-SBZ9032C03R16" YS-SBZ9032C03R16 336,-982.61 r180 bottom
LS4 "YS-SBZ9032C03R16" YS-SBZ9032C03R16 -300,-952.61 r180 bottom
P1 "Test Point" "TEST POINT" -1204,-199.61 r190 bottom
P2 "Test Point" "TEST POINT" -1219,-57.61 r182 bottom
P3 "Test Point" "TEST POINT" -1174,-327.61 r195 bottom
P4 "Test Point" "TEST POINT" -1130,-457.61 r202 bottom
P5 "Test Point" "TEST POINT" -996,-700.61 r215 bottom
P6 "Test Point" "TEST POINT" -1072,-579.61 r209 bottom
P7 "Test Point" "TEST POINT" -1218,67.39 r180 bottom
P8 "Test Point" "TEST POINT" -914,-806.61 r222 bottom
P9 "Test Point" "TEST POINT" -1205,189.39 r170 bottom
Q1 "BSS138LT1G" SOT23-3 514.68,358.61 r270 bottom
Q2 "BSS138LT1G" SOT23-3 697.4,357.19 r180 bottom
Q3 "BSS138LT1G" SOT23-3 -219,-144.61 r270 bottom
Q4 "BSS138LT1G" SOT23-3 756,90.89 r180 bottom
Q5 "BSS138LT1G" SOT23-3 734,221.89 r90 bottom
Q8 "BSS138LT1G" SOT23-3 733,-460.04 r180 bottom
Q9 "BSS138LT1G" SOT23-3 888.68,-274.22 r270 bottom
Q10 "BSS138LT1G" SOT23-3 -609,-976.61 r270 bottom
Q11 "BSS138LT1G" SOT23-3 28,-1006.61 r270 bottom
Q12 "MMBT3904-TP" SOT-23F -28,-739.93 r270 bottom
Q13a "MMBT3904-TP" SOT-23F -781,-353 r180 bottom
R1 "10K" Res-0201 438,357.56 r270 bottom
R2 "10K" Res-0201 614,316.62 r270 bottom
R3 "10K" Res-0201 652,423.39 r0 bottom
R4 "10K" Res-0201 630,260.89 r90 bottom
R5 "10K" Res-0201 -301,-141.61 r0 bottom
R6 "10K" Res-0201 -132,21.39 r90 bottom
R7 "10K" Res-0201 799.83,156.39 r180 bottom
R8 "10K" Res-0201 795.17,2.39 r180 bottom
R9 "10K" Res-0201 825,211.39 r90 bottom
R10 "10K" Res-0201 785,316.62 r270 bottom
R13 "402K" Res0603 -402.5,268.4 r90 bottom
R14 "100K" Res0402 -397.5,177.39 r270 bottom
R15 "402K" Res0603 -484,-29.1 r180 bottom
R16 "100K" Res0402 -394,-34.1 r0 bottom
R17 "1M" Res0402 -637.5,244.4 r270 bottom
R18 "1M" Res0402 -478,-236.61 r90 bottom
R19 "4.7K" Res-0201 616,-37.61 r0 bottom
R20 "10K" Res-0201 270,-159.83 r90 bottom
R21 "10K" Res-0201 84.82,122.89 r180 bottom
R22 "10K" Res-0201 84.82,152.89 r180 bottom
R23 "10K" Res-0201 339.68,-372.28 r180 bottom
R24 "10K" Res-0201 819,-500.61 r270 bottom
R25 "10K" Res-0201 937,-198.61 r0 bottom
R26 "10K" Res-0201 -568.43,-895.61 r180 bottom
R27 "10K" Res-0201 67.57,-921.61 r0 bottom
R28 "47R" Res-0201 653,-500.61 r90 bottom
R29 "47R" Res-0201 937,-355.61 r180 bottom
R30 "47R" Res-0201 -568.43,-1057.61 r180 bottom
R31 "47R" Res-0201 67.57,-1086.61 r180 bottom
R32 "10K" Res-0201 56.74,-787.93 r0 bottom
R33 "10K" Res-0201 -24,-656 r180 bottom
R33a "10K" Res-0201 -701,-327 r90 bottom
R34 "10K" Res-0201 -176.17,-669 r0 bottom
R34a "10K" Res-0201 -874.83,-352 r180 bottom
R35a "10K" Res-0201 -920,-187 r0 bottom
SB1 "Solder Bridge" "Solder Bridge" 3,217.39 r180 top
SB2 "Solder Bridge" "Solder Bridge" 3,280.39 r180 top
SB3 "Solder Bridge" "Solder Bridge" 946,-71.61 r270 bottom
SB4 "Solder Bridge" "Solder Bridge" 859,-97.61 r0 bottom
SB5 "Solder Bridge_H" "Solder Bridge throgh hole" -2098,162.39 r90 bottom
SB6 "Solder Bridge_H" "Solder Bridge throgh hole" -2098,-60.61 r90 bottom
SB7 "Solder Bridge" "Solder Bridge" -201,23.39 r180 bottom
SB8 "Solder Bridge" "Solder Bridge" 547,-182.11 r270 bottom
SB9 "Solder Bridge" "Solder Bridge" 531,224.89 r90 bottom
SB10 "Solder Bridge" "Solder Bridge" 589,224.89 r90 bottom
SB11 "Solder Bridge" "Solder Bridge" 596,102.39 r90 bottom
SB12 "Solder Bridge" "Solder Bridge" 657,101.39 r90 bottom
SB13 "Solder Bridge" "Solder Bridge" 122,-142.61 r0 bottom
SB14 "Solder Bridge" "Solder Bridge" 144,-348.73 r0 bottom
SB15 "Solder Bridge" "Solder Bridge" -43,-464 r180 bottom
SB16 "Solder Bridge" "Solder Bridge" -1001,-337 r90 bottom
SB17 "Solder Bridge" "Solder Bridge" -50,-342.61 r0 bottom
SB18 "Solder Bridge" "Solder Bridge" -50,-400.61 r0 bottom
SB19 "Solder Bridge" "Solder Bridge" -20,-550.61 r270 bottom
SB20 "Solder Bridge" "Solder Bridge" 533,-396.61 r0 bottom
SB_L1 "Solder Bridge" "Solder Bridge" 1000,-1229.61 r270 bottom
SB_L2 "Solder Bridge" "Solder Bridge" 914,-1257.61 r180 bottom
SB_L3 "Solder Bridge" "Solder Bridge" 1707,-79.61 r180 bottom
SB_L4 "Solder Bridge" "Solder Bridge" 1679,10.39 r270 bottom
SW1 "B3U-1000P" B3U-1000P 670,-206.11 r0 bottom
SW2 "PBS-110" PBS-110 -8,-242.61 r0 bottom
U1 "TPS61230DRCR" "10-VSON (3x3)" -507.5,174.4 r0 bottom
U2 "TPS61230DRCR" "10-VSON (3x3)" -428.37,-129.22 r90 bottom
U3 "ATTINY1616-MNR" 20-QFN 494,-14.11 r90 bottom
U4 "NCP186AMX330TAG" NCP186AMX330TAG 318.33,-162.74 r180 bottom
U5 "PCF8563T/5,518" 8-SO 355.82,237.89 r180 bottom
U6 "TPS61240DRVR" TPS61240DRVR 424,-338.28 r180 bottom
X1 "32.7680KHZ" CM200C32768DZFT 215.27,412.38 r180 bottom

## Footprints (in the part's own frame and the unit in brackets; to place one, negate y for a bottom-side part, rotate by r counter-clockwise, add the part's x,y. Pads: shape width x height; smd on the part's side, far side on the other; paste and mask are expansions set on the pad)
8-SO [mm] "IC RTC CLK/CALENDAR I2C 8-SOIC"
  rect 1.2x0.8 smd: 1(0,0) 2(0,-1.27) 3(0,-2.54) 4(0,-3.81) 5(5.5,-3.81) 6(5.5,-2.54) 7(5.5,-1.27) 8(5.5,0)
  silkscreen extent -0.46,-4.39 4.19,0.76, body extent -0.32,-4.36 5.46,0.55, height 1.45
"10-VSON (3x3)" [mm] "IC REG BOOST ADJ 4A 10VSON"
  rect 0.6x0.24 smd: 1(-1.4,1) 2(-1.4,0.5) 3(-1.4,0) 4(-1.4,-0.5) 5(-1.4,-1) 6(1.4,-1) 7(1.4,-0.5) 8(1.4,0) 9(1.4,0.5) 10(1.4,1)
  rect 1.6x2.15 smd: 11(0,0)
  silkscreen extent -1.8,-1.5 1.49,1.52, body extent -1.5,-1.5 1.5,1.5, height 1
20-QFN [mm] "IC MCU 8BIT 16KB FLASH 20VQFN"
  rect 0.8x0.2 smd: 1(-1.5,0.8) 2(-1.5,0.4) 3(-1.5,0) 4(-1.5,-0.4) 5(-1.5,-0.8) 11(1.5,-0.8) 12(1.5,-0.4) 13(1.5,0) 14(1.5,0.4) 15(1.5,0.8)
  rect 0.2x0.8 smd: 6(-0.8,-1.5) 7(-0.4,-1.5) 8(0,-1.5) 9(0.4,-1.5) 10(0.8,-1.5) 16(0.8,1.5) 17(0.4,1.5) 18(0,1.5) 19(-0.4,1.5) 20(-0.8,1.5)
  rect 1.8x1.8 smd: 21(0,0)
  silkscreen extent -1.83,-1.52 1.52,1.52, body extent -1.5,-1.5 1.5,1.5, height 0.59
1255AY-1R0N=P3 [mm] "FIXED IND 1UH 6.5A 10 MOHM SMD"
  rect 1.6x5.7 smd: 1(-2.35,0) 2(2.35,0)
  silkscreen extent -1.04,-3.02 1.04,3.05, body extent -3,-3 3,3, height 4.5
B3U-1000P [mm] "SWITCH TACTILE SPST-NO 0.05A 12V"
  rect 0.82x1.72 smd: 1(-1.7,0) 2(1.7,0)
  silkscreen extent -1.35,-1.32 1.32,1.3, body extent -2,-1.26 2,1.24, height 1.6
Cap0402 [mil]
  rect 18x25 smd mask+2.36: 1(-18.5,0) 2(18.5,0)
  silkscreen extent -31,-16 31,16, body extent -20,-10 20,10, height 19
Cap0603 [mil]
  rect 30x35 smd mask+2.36: 1(-30,0) 2(30,0)
  silkscreen extent -49,-21 49,21, body extent -32,-16 31,16, height 34
Cap0805 [mil] "SMD 0805"
  rect 40x60 smd mask+2.76: 1(-40,0) 2(40,0)
  silkscreen extent -64,-34 64,34, body extent -39,-25 39,25, height 30
"CAP 0201" [mm]
  rect 0.3x0.3 smd mask+0.055: 1(-0.3,0) 2(0.3,0)
  silkscreen extent -0.53,-0.23 0.53,0.23, body extent -0.3,-0.15 0.3,0.15, height 0.28
CM200C32768DZFT [mm] "CRYSTAL 32.7680KHZ 12.5PF SMD"
  rect 1.3x1.9 smd: 1(-2.75,-1.6) 2(2.75,-1.6) 3(2.75,1.6) 4(-2.75,1.6)
  silkscreen extent -3.94,-2.2 3.95,1.82, body extent -4,-1.9 4,1.91, height 2.49
HCB1005MF-100T25 [mm] "10O @ 100MHz 2.5A 1 50mO 0402 Ferrite Beads RoHS"
  rect 0.5x0.6 smd: 1(-0.45,0) 2(0.45,0)
  silkscreen extent -0.79,-0.41 0.79,0.39, body extent -0.5,-0.25 0.5,0.25, height 0.48
"IND 0201" [mm]
  rect 0.25x0.3 smd mask+0.055: 1(-0.275,0) 2(0.275,0)
  silkscreen extent -0.48,-0.23 0.48,0.23, body extent -0.3,-0.15 0.3,0.15, height 0.15
"IND 0402 (1005 Metric)" [mm] "FIXED IND 20NH 350MA 600 MOHM"
  rect 0.41x0.66 smd: 1(-0.505,0) 2(0.505,0)
  silkscreen extent -0.81,-0.43 0.81,0.43, body extent -0.5,-0.3 0.5,0.3, height 0.6
"IND 0603" [mm]
  rect 0.9x0.97 smd: 1(-0.785,0) 2(0.785,0)
  silkscreen extent -1.35,-0.58 1.35,0.58, body extent -0.8,-0.4 0.8,0.4, height 0.76
NCP186AMX330TAG [mm]
  rect 0.37x0.28 smd: 1(-0.525,0.6) 2(-0.525,0.2) 3(-0.525,-0.2) 4(-0.525,-0.6) 5(0.525,-0.6) 6(0.525,-0.2) 7(0.525,0.2) 8(0.525,0.6)
  rect 0.44x1.44 smd: 9(0,0)
  silkscreen extent -0.97,-0.86 0.56,0.86, body extent -0.6,-0.8 0.6,0.8, height 0.39
PBS-110 [mm]
  rect 1.5x3 smd: 1(-2.05,0) 2(2.05,0)
  silkscreen extent -2.9,-1.6 2.9,1.6
PZ254V-11-05P [mm] "Through Hole,P=2.54mm"
  rect 2x2 hole 1.02: 1(-5.08,0)
  round 2 hole 1.02: 2(-2.54,0) 3(0,0) 4(2.54,0) 5(5.08,0)
  silkscreen extent -6.35,-1.27 6.35,1.27, body extent -6.35,-1.27 6.35,1.27, height 8.64
Res0402 [mil]
  rect 18x25 smd mask+4: 1(-18.5,0) 2(18.5,0)
  silkscreen extent -32,-17 32,16, body extent -23,-11 23,11, height 16
Res0603 [mil]
  rect 30x35 smd: 1(-30,0) 2(30,0)
  silkscreen extent -49,-21 49,21, body extent -31,-17 31,17, height 18
Res-0201 [mm]
  rect 0.27x0.37 smd: 1(-0.275,0) 2(0.275,0)
  silkscreen extent -0.48,-0.25 0.48,0.25, body extent -0.3,-0.15 0.3,0.15, height 0.29
"Solder Bridge" [mil] "Solder Bridge ON"
  rect 30x35 smd: 1(-30,0) 2(30,0)
  silkscreen extent -49,-21 49,21
"Solder Bridge throgh hole" [mm]
  rect 1.5x1.5 hole 0.9: 1(-2.54,0)
  round 1.5 hole 0.9: 2(0,0)
  silkscreen extent -3.81,-1.27 1.27,1.27
SOT23-3 [mm] "SOT23, 3-Leads, Body 2.9x1.3mm, Pitch 0.95mm, Lead Span 2.3mm - Reverse Pinning, IPC High Density"
  rect 0.8x0.8 smd: 1(-0.95,-1.075) 2(0.95,-1.075) 3(0,1.075)
  silkscreen extent -1.68,-1.22 1.55,0.74, body extent -1.5,-1.25 1.5,1.25, height 1.05
SOT-23F [mm]
  rect 0.8x0.9 smd: 1(-0.95,-1.05) 2(0.95,-1.05) 3(0,1.05)
  silkscreen extent -1.68,-0.97 1.47,0.86, body extent -1.45,-1.2 1.45,1.2, height 0.89
"TEST POINT" [mil]
  oct 60x60 smd: 1(0,0)
  silkscreen extent -37,-37 37,37
"THT PAD" [mm]
  round 1.6 hole 1: 1(0,0) 2(2.54,0)
  silkscreen extent -1.07,-1.07 3.61,1.09
TPS61240DRVR [mm] "IC REG BOOST 5V 500MA 6SON"
  rect 0.45x0.3 smd: 1(-0.975,0.65) 2(-0.975,0) 3(-0.975,-0.65) 4(0.975,-0.65) 5(0.975,0) 6(0.975,0.65)
  rect 1x1.6 smd: 7(0,0)
  silkscreen extent -1.3,-1.02 0.89,1.04, body extent -1,-1 1,1, height 0.8
WS2812B-Mini [mm] "SMD,3.5x3.5mm Light Emitting Diodes (LED) RoHS"
  rect 1.5x1 smd: 1(-1.64,0.79) 2(-1.64,-0.79) 3(1.64,-0.79) 4(1.64,0.79)
  silkscreen extent -2.31,-1.78 1.78,1.78, body extent -1.84,-1.74 1.84,1.74, height 1.95
YS-SBZ9032C03R16 [mm] "NO 2700Hz 85dB @ 3V, 10cm 3V F9mm SMD,9x3.2mm Buzzers RoHS"
  rect 2.8x1.8 smd: 1(-4,0) 1(-4,0) 1(-4,0) 2(4,0)
  silkscreen extent -6.01,-5.91 6.13,4.57, body extent -5.24,-5.97 5.26,4.53, height 3.21

## Part data
C1 C2 C3 C4 C5 C6: library part GRM21BR60J226ME39K, "CAP CER 22UF 6.3V X5R 0805", Case Code (Imperial)=0805, Case Code (Metric)=2012, Dielectric=X5R, Manufacturer=Murata, Max Operating Temperature=85°C, Min Operating Temperature=-55°C, Package Quantity=1, Supplier Part Number 1=490-6471-1-ND, Tolerance=20%, Voltage=6.3V, Capacitance=22uF, Case/Package=0805, Category="Ceramic Capacitors", ComponentLink1Description=https://datasheet.ciiva.com/6270/partnumbering-e-01-6270375.pdf?src-supplier=Digi-Key, ComponentLink1URL=https://datasheet.ciiva.com/6270/partnumbering-e-01-6270375.pdf?src-supplier=Digi-Key, ComponentLink2Description=https://datasheet.ciiva.com/6270/partnumbering-e-01-6270377.pdf?src-supplier=Digi-Key, ComponentLink2URL=https://datasheet.ciiva.com/6270/partnumbering-e-01-6270377.pdf?src-supplier=Digi-Key, ComponentLink3Description=https://datasheet.ciiva.com/5413/product-5413083.pdf?src-supplier=Mouser, ComponentLink3URL=https://datasheet.ciiva.com/5413/product-5413083.pdf?src-supplier=Mouser, ComponentLink4Description=https://datasheet.ciiva.com/11607/product-11607325.pdf?src-supplier=Avnet, ComponentLink4URL=https://datasheet.ciiva.com/11607/product-11607325.pdf?src-supplier=Avnet, Construction=Flat, Depth=1.25mm, Height=1.25mm, Lead Free="Lead Free", Length=2mm, Manufacturer Part Number=GRM21BR60J226ME39K, Mount="Surface Mount", Packaging="Tape and Reel", Pricing 1="1=0.33000, 10=0.22500, 50=0.15020, 100=0.12770, 500=0.09012, 1000=0.07886, 2500=0.07511, 5000=0.06947 (USD)", Radiation Hardening=No, RoHS=Yes, RoHS Compliant=Yes, Series=GRM, Stock 1=70081, Supplier 1=Digi-Key, Termination=SMD/SMT, Thickness=0.053inch, Voltage Rating=6.3V, Voltage Rating (DC)=6.3V, Width=0.049inch
C7 C8: library part GRM033R71C103KE14D, "CAP CER 10000PF 16V X7R 0201", Dielectric=X7R, Manufacturer=Murata, Supplier Part Number 1=490-14453-1-ND, Tolerance=10%, Voltage Rating (DC)=16V, Capacitance=10nF, Category="Ceramic Capacitors", ComponentLink1Description=http://www.farnell.com/datasheets/2867848.pdf?src-supplier=Farnell, ComponentLink1URL=http://www.farnell.com/datasheets/2867848.pdf?src-supplier=Farnell, ComponentLink2Description=http://search.murata.co.jp/Ceramy/image/img/A01X/G101/ENG/GRM033R71C103KE14-01.pdf?src-supplier=Digi-Key, ComponentLink2URL=http://search.murata.co.jp/Ceramy/image/img/A01X/G101/ENG/GRM033R71C103KE14-01.pdf?src-supplier=Digi-Key, ComponentLink3Description=http://www.farnell.com/datasheets/2867848.pdf?src-supplier=Newark, ComponentLink3URL=http://www.farnell.com/datasheets/2867848.pdf?src-supplier=Newark, ComponentLink4Description=http://www.farnell.com/datasheets/2722745.pdf?src-supplier=Element14, ComponentLink4URL=http://www.farnell.com/datasheets/2722745.pdf?src-supplier=Element14, Length=600um, Manufacturer Part Number=GRM033R71C103KE14D, Pricing 1="1=0.10000, 10=0.01700, 50=0.00920, 100=0.00750, 500=0.00540, 1000=0.00424, 2500=0.00385, 5000=0.00354 (USD)", RoHS=Yes, RoHS Compliant=Yes, Stock 1=12651, Supplier 1=Digi-Key, Thickness=300um, Width=300um
C9 C11 C12 C15 C18 C21 C23 C26 C30 C31 C32 C33 C34 C35 C36 C37 C38 C39 C40 C41 C42 C43 C44 C45 C46 C47 C48 C49 C50 C51 C52 C53 C54 C55 C56 C57 C58 C59 C60 C61 C62 C63 C64 C65 C66 C67 C69 C70 C71 C72 C73 C74 C75 C76 C77 C78 C79 C80 C81 C82 C83 C84 C85 C86 C87 C88 C89 C90 C91 C92 C93 C94 C95 C96 C97 C98 C99 C100 C101 C102 C103 C104 C105 C106 C107 C108 C109 C110 C111 C112 C113 C114 C115 C116 C117 C118 C119 C120 C121 C122 C123 C124 C125 C126 C127 C128 C129 C130 C131 C132 C133 C134 C135 C136 C137 C138 C139 C140 C141 C142 C143 C144 C145 C146 C147 C148 C149 C150 C151 C152 C153 C154 C155 C156 C157 C158 C159 C160 C161 C162 C163 C164 C165 C166 C167 C168 C169 C170 C171 C172 C173 C174 C175 C176 C177 C178 C179 C180 C181 C182 C183 C184 C185 C186 C187 C188 C189: library part CC0402KRX7R8BB104, "CAP CER 0.1UF 25V X7R 0402", Case Code (Imperial)=0402, Case Code (Metric)=1005, Dielectric=X7R, Manufacturer=Yageo, Max Operating Temperature=125°C, Min Operating Temperature=-55°C, Resistor Type=Ceramic, Supplier Part Number 1=311-2077-1-ND, Tolerance=10%, Voltage Rating=25V, Capacitance=100nF, Case/Package=0402, Category="Ceramic Capacitors", ComponentLink1Description=https://datasheet.ciiva.com/11464/upy-gphc-x7r-6-3v-to-50v-8-11464889.pdf?src-supplier=Avnet, ComponentLink1URL=https://datasheet.ciiva.com/11464/upy-gphc-x7r-6-3v-to-50v-8-11464889.pdf?src-supplier=Avnet, ComponentLink2Description=https://datasheet.ciiva.com/13210/upy-gphc-x7r-6-3v-to-50v-8-12304-13210908.pdf?src-supplier=Mouser, ComponentLink2URL=https://datasheet.ciiva.com/13210/upy-gphc-x7r-6-3v-to-50v-8-12304-13210908.pdf?src-supplier=Mouser, ComponentLink3Description=https://datasheet.ciiva.com/17437/upy-gphc-x7r-6-3v-to-50v-8-17437357.pdf?src-supplier=Avnet+Europe, ComponentLink3URL=https://datasheet.ciiva.com/17437/upy-gphc-x7r-6-3v-to-50v-8-17437357.pdf?src-supplier=Avnet+Europe, Depth=0.5mm, Dissipation Factor=3.5%, Halogen Free="Halogen Free", Height=0.5mm, Lead Free="Lead Free", Length=1mm, Manufacturer Part Number=CC0402KRX7R8BB104, Mount="Surface Mount", Packaging="Tape and Reel", Pricing 1="1=0.10000, 10=0.03100, 50=0.01700, 100=0.01390, 500=0.00990, 1000=0.00777, 2500=0.00707, 5000=0.00650 (USD)", Radiation Hardening=No, RoHS=Yes, Stock 1=1841009, Supplier 1=Digi-Key, Termination=SMD/SMT, Thickness=0.022inch, Voltage Rating (DC)=25V, Width=0.02inch
C10 C13 C16 C19 C22 C24 C25 C27 C29: library part GRM155R61E105KA12D, "CAP CER 1UF 25V X5R 0402", Capacitance=1uF, Case Code (Imperial)=0402, Case Code (Metric)=1005, Dielectric=X5R, Manufacturer=Murata, Max Operating Temperature=85°C, Min Operating Temperature=-55°C, Package Quantity=10000, Supplier Part Number 1=490-10017-1-ND, Tolerance=10%, Voltage=25V, Case/Package=0402, Category="Ceramic Capacitors", ComponentLink1Description=https://datasheet.ciiva.com/22732/1666664-22732122.pdf?src-supplier=Element14, ComponentLink1URL=https://datasheet.ciiva.com/22732/1666664-22732122.pdf?src-supplier=Element14, ComponentLink2Description=https://datasheet.ciiva.com/7719/1666664-7719006.pdf?src-supplier=Element14, ComponentLink2URL=https://datasheet.ciiva.com/7719/1666664-7719006.pdf?src-supplier=Element14, Depth=0.5mm, Height=0.5mm, Lead Free="Lead Free", Length=1mm, Manufacturer Part Number=GRM155R61E105KA12D, Material=Ceramic, Mount="Surface Mount", Packaging="Tape and Reel", Pricing 1="1=0.11000, 10=0.08000, 50=0.04360, 100=0.03560, 500=0.02542, 1000=0.01997, 2500=0.01815, 5000=0.01670 (USD)", REACH SVHC="No SVHC", RoHS=Yes, Series=GRM, Stock 1=961231, Supplier 1=Digi-Key, Termination=SMD/SMT, Thickness=0.022inch, Voltage Rating=25V, Voltage Rating (DC)=25V, Weight=0.000212oz, Width=0.5mm
C14 C17 C20: library part CL05A225KA5NUNC, "CAP CER 2.2UF 25V X5R 0402", Case Code (Imperial)=0402, Case Code (Metric)=1005, Manufacturer=Samsung, Max Operating Temperature=85°C, Min Operating Temperature=-55°C, Package Quantity=1, Supplier Part Number 1=1276-1460-1-ND, Tolerance=10%, Voltage Rating=25V, Capacitance=2.2uF, Case/Package=0402, Category="Ceramic Capacitors", ComponentLink1Description=https://datasheet.ciiva.com/25790/cl05a225ka5nunc-25790835.pdf?src-supplier=Digi-Key, ComponentLink1URL=https://datasheet.ciiva.com/25790/cl05a225ka5nunc-25790835.pdf?src-supplier=Digi-Key, Length=0.039inch, Manufacturer Part Number=CL05A225KA5NUNC, Mount="Surface Mount", Packaging="Cut Tape", Pricing 1="1=0.35000, 10=0.23700, 50=0.15820, 100=0.13440, 500=0.09488, 1000=0.08302, 2500=0.07907, 5000=0.07314 (USD)", RoHS=Yes, Stock 1=10124, Supplier 1=Digi-Key, Thickness=0.022inch, Width=0.02inch
C28: library part CC0402MRX5R5BB475, "CAP CER 4.7UF 6.3V X5R 0402", Case Code (Imperial)=0402, Case Code (Metric)=1005, Dielectric=X5R, Manufacturer=Yageo, Max Operating Temperature=85°C, Min Operating Temperature=-55°C, Resistor Type=Ceramic, Supplier Part Number 1=311-1730-1-ND, Tolerance=20%, Voltage=4V, Voltage Rating=6.3V, Capacitance=4.7uF, Case/Package=0402, Category="Ceramic Capacitors", ComponentLink1Description=http://components.arrow.com/part/dataview/0323_04166410?src-supplier=Arrow+Europe, ComponentLink1URL=http://components.arrow.com/part/dataview/0323_04166410?src-supplier=Arrow+Europe, ComponentLink2Description=http://www.mouser.com/ds/2/447/UPY-GPHC_X5R_4V-to-50V_25-1131599.pdf?src-supplier=Mouser, ComponentLink2URL=http://www.mouser.com/ds/2/447/UPY-GPHC_X5R_4V-to-50V_25-1131599.pdf?src-supplier=Mouser, ComponentLink3Description=http://www.yageo.com/documents/recent/UPY-GPHC_X5R_4V-to-50V_25.pdf?src-supplier=Digi-Key, ComponentLink3URL=http://www.yageo.com/documents/recent/UPY-GPHC_X5R_4V-to-50V_25.pdf?src-supplier=Digi-Key, ComponentLink4Description=http://www.yageo.com/documents/recent/UPY-GPHC_X5R_4V-to-50V_12.pdf?src-supplier=Avnet, ComponentLink4URL=http://www.yageo.com/documents/recent/UPY-GPHC_X5R_4V-to-50V_12.pdf?src-supplier=Avnet, ComponentLink5Description=http://www.yageo.com/documents/recent/UPY-GPHC_X5R_4V-to-50V_12.pdf?src-supplier=Avnet+Europe, ComponentLink5URL=http://www.yageo.com/documents/recent/UPY-GPHC_X5R_4V-to-50V_12.pdf?src-supplier=Avnet+Europe, ComponentLink6Description=http://www.yageo.com/exep/pages/download/literatures/ProductSelectionGuide%202014_Final_2.pdf?src-supplier=Digi-Key, ComponentLink6URL=http://www.yageo.com/exep/pages/download/literatures/ProductSelectionGuide%202014_Final_2.pdf?src-supplier=Digi-Key, Depth=0.5mm, Halogen Free="Halogen Free", Height=0.5mm, Lead Free="Lead Free", Length=1mm, Manufacturer Part Number=CC0402MRX5R5BB475, Mount="Surface Mount", Packaging="Tape and Reel", Pricing 1="1=0.18000, 10=0.12400, 50=0.07460, 100=0.06300, 500=0.04308, 1000=0.03810, 2500=0.03644, 5000=0.03313 (USD)", Radiation Hardening=No, RoHS=Yes, Stock 1=47905, Supplier 1=Digi-Key, Termination=SMD/SMT, Thickness=0.022inch, Voltage Rating (DC)=6.3V, Weight=2.3E-05oz, Width=0.02inch
C68: library part CC0402KRX7R8BB104, "CAP CER 0.1UF 25V X7R 0402", Case/Package=0402, Case Code (Metric)=1005, Dielectric=X7R, Manufacturer=Yageo, Max Operating Temperature=125°C, Min Operating Temperature=-55°C, Resistor Type=Ceramic, Supplier Part Number 1=311-2077-1-ND, Tolerance=10%, Voltage Rating=25V, Capacitance=100nF, Case Code (Imperial)=0402, Category="Ceramic Capacitors", ComponentLink1Description=https://datasheet.ciiva.com/11464/upy-gphc-x7r-6-3v-to-50v-8-11464889.pdf?src-supplier=Avnet, ComponentLink1URL=https://datasheet.ciiva.com/11464/upy-gphc-x7r-6-3v-to-50v-8-11464889.pdf?src-supplier=Avnet, ComponentLink2Description=https://datasheet.ciiva.com/13210/upy-gphc-x7r-6-3v-to-50v-8-12304-13210908.pdf?src-supplier=Mouser, ComponentLink2URL=https://datasheet.ciiva.com/13210/upy-gphc-x7r-6-3v-to-50v-8-12304-13210908.pdf?src-supplier=Mouser, ComponentLink3Description=https://datasheet.ciiva.com/17437/upy-gphc-x7r-6-3v-to-50v-8-17437357.pdf?src-supplier=Avnet+Europe, ComponentLink3URL=https://datasheet.ciiva.com/17437/upy-gphc-x7r-6-3v-to-50v-8-17437357.pdf?src-supplier=Avnet+Europe, Depth=0.5mm, Dissipation Factor=3.5%, Halogen Free="Halogen Free", Height=0.5mm, Lead Free="Lead Free", Length=1mm, Manufacturer Part Number=CC0402KRX7R8BB104, Mount="Surface Mount", Packaging="Tape and Reel", Pricing 1="1=0.10000, 10=0.03100, 50=0.01700, 100=0.01390, 500=0.00990, 1000=0.00777, 2500=0.00707, 5000=0.00650 (USD)", Radiation Hardening=No, RoHS=Yes, Stock 1=1841009, Supplier 1=Digi-Key, Termination=SMD/SMT, Thickness=0.022inch, Voltage Rating (DC)=25V, Width=0.02inch
C191 C192a: library part GRM188R61E106KA73D, "CAP CER 10UF 25V X5R 0603", Case/Package=0603, Manufacturer=Murata, Supplier Part Number 1=81-GRM188R61E106KA3D, Category="Ceramic Capacitors", ComponentLink1Description=https://search.murata.co.jp/Ceramy/image/img/A01X/G101/ENG/GRM188R61E106KA73-01.pdf?src-supplier=Digi-Key, ComponentLink1URL=https://search.murata.co.jp/Ceramy/image/img/A01X/G101/ENG/GRM188R61E106KA73-01.pdf?src-supplier=Digi-Key, Manufacturer Part Number=GRM188R61E106KA73D, Pricing 1="1=0.36000, 10=0.25800, 50=0.25800, 100=0.15500, 1000=0.09800, 10000=0.06900 (USD)", RoHS=Yes, RoHS Compliant=Yes, Stock 1=319428, Supplier 1=Mouser
D1 D2 D3 D4: "DIODE GEN PURP 50V 215MA SOT23", Average Rectified Current=215mA, Case/Package=TO-236-3, Forward Current=150mA, Forward Voltage=1.25V, Manufacturer="NXP Semiconductors", Manufacturer Part Number=BAL74215, Max Forward Surge Current (Ifsm)=4A, Max Operating Temperature=150°C, Max Repetitive Reverse Voltage (Vrrm)=50V, Max Reverse Current=100nA, Min Operating Temperature=-65°C, Package Quantity=1, Supplier Part Number 1=75R4923, Category="Rectifier Diodes", ComponentLink1Description=https://datasheet.ciiva.com/8299/bal74-8299264.pdf?src-supplier=Avnet, ComponentLink1URL=https://datasheet.ciiva.com/8299/bal74-8299264.pdf?src-supplier=Avnet, ComponentLink2Description=https://datasheet.ciiva.com/1179/453930-1179601.pdf?src-supplier=Element14, ComponentLink2URL=https://datasheet.ciiva.com/1179/453930-1179601.pdf?src-supplier=Element14, ComponentLink3Description=https://datasheet.ciiva.com/4434/bal74-109975-4434835.pdf?src-supplier=Mouser, ComponentLink3URL=https://datasheet.ciiva.com/4434/bal74-109975-4434835.pdf?src-supplier=Mouser, ComponentLink4Description=https://datasheet.ciiva.com/25953/bal74-25953738.pdf?src-supplier=Avnet+Europe, ComponentLink4URL=https://datasheet.ciiva.com/25953/bal74-25953738.pdf?src-supplier=Avnet+Europe, ComponentLink5Description=https://datasheet.ciiva.com/912/bal74-912156.pdf?src-supplier=Digi-Key, ComponentLink5URL=https://datasheet.ciiva.com/912/bal74-912156.pdf?src-supplier=Digi-Key, ComponentLink6Description=https://datasheet.ciiva.com/1202/453930-1202220.pdf?src-supplier=Farnell, ComponentLink6URL=https://datasheet.ciiva.com/1202/453930-1202220.pdf?src-supplier=Farnell, ComponentLink7Description=https://datasheet.ciiva.com/912/bal74-912157.pdf?src-supplier=Digi-Key, ComponentLink7URL=https://datasheet.ciiva.com/912/bal74-912157.pdf?src-supplier=Digi-Key, ComponentLink8Description=https://datasheet.ciiva.com/1202/453930-1202221.pdf?src-supplier=Farnell, ComponentLink8URL=https://datasheet.ciiva.com/1202/453930-1202221.pdf?src-supplier=Farnell, ComponentLink9Description=https://datasheet.ciiva.com/912/bal74-912158.pdf?src-supplier=Digi-Key, ComponentLink9URL=https://datasheet.ciiva.com/912/bal74-912158.pdf?src-supplier=Digi-Key, Contact Plating=Tin, Element Configuration=Single, Lead Free="Lead Free", Max Reverse Leakage Current=100nA, Max Reverse Voltage (DC)=50V, Max Surge Current=4A, Mount="Surface Mount", Number of Pins=3, Packaging="Tape and Reel", Peak Non-Repetitive Surge Current=4A, Radiation Hardening=No, REACH SVHC="No SVHC", Recovery Time=4ns, Reverse Recovery Time=4ns, RoHS=Yes, Supplier 1=Newark, Termination=SMD/SMT
D5 D5a: "MOSFET P-CH 30V 4A SOT23F", Case/Package=SOT-23-3, Continuous Drain Current (ID)=4A, Drain to Source Breakdown Voltage=-30V, Drain to Source Resistance=136mR, Drain to Source Voltage (Vdss)=30V, Gate to Source Voltage (Vgs)=20V, Input Capacitance=280pF, Manufacturer=Toshiba, Max Operating Temperature=150°C, Max Power Dissipation=1W, Min Operating Temperature=-55°C, Package Quantity=1, Supplier Part Number 1=SSM3J334RLFCT-ND, Category=MOSFETs, ComponentLink1Description=https://datasheet.ciiva.com/6375/ssm3j334r-datasheet-en-20140301-6375723.pdf?src-supplier=Digi-Key, ComponentLink1URL=https://datasheet.ciiva.com/6375/ssm3j334r-datasheet-en-20140301-6375723.pdf?src-supplier=Digi-Key, ComponentLink2Description=https://datasheet.ciiva.com/6373/ssm3j334r-datasheet-en-20140301-6373837.pdf?src-supplier=Digi-Key, ComponentLink2URL=https://datasheet.ciiva.com/6373/ssm3j334r-datasheet-en-20140301-6373837.pdf?src-supplier=Digi-Key, Element Configuration=Single, Manufacturer Part Number=SSM3J334R,LF, Mount="Surface Mount", Number of Elements=1, Number of Pins=3, Packaging="Tape and Reel", Power Dissipation=1W, Pricing 1="1=0.47000, 10=0.33100, 25=0.30800, 100=0.16720, 500=0.13640, 1000=0.10120 (USD)", Rds On Max=71mR, RoHS=Yes, Stock 1=79343, Supplier 1=Digi-Key
J1: "Pin Header 5 1 right-angle", Manufacturer=XFCN, Brand Category="Made In Asia Brands", Connector Type="Pin Header", Number of Pins=5, Number of Rows=1, Packaging=Bag-packed, Pitch=2.54